# Altium PCB FMM-v1.0.PcbDoc (part 1 of 5)
Units mm, origin at the board's own origin, x right, y up, seen from the top; angles counter-clockwise.
Board outline 115 x 96 mm, 4 copper layers (Top Layer, Power Layer, Ground Layer, Bottom Layer), stack 1.57 mm thick; 218 components, 129 nets, 744 pads, 321 vias.
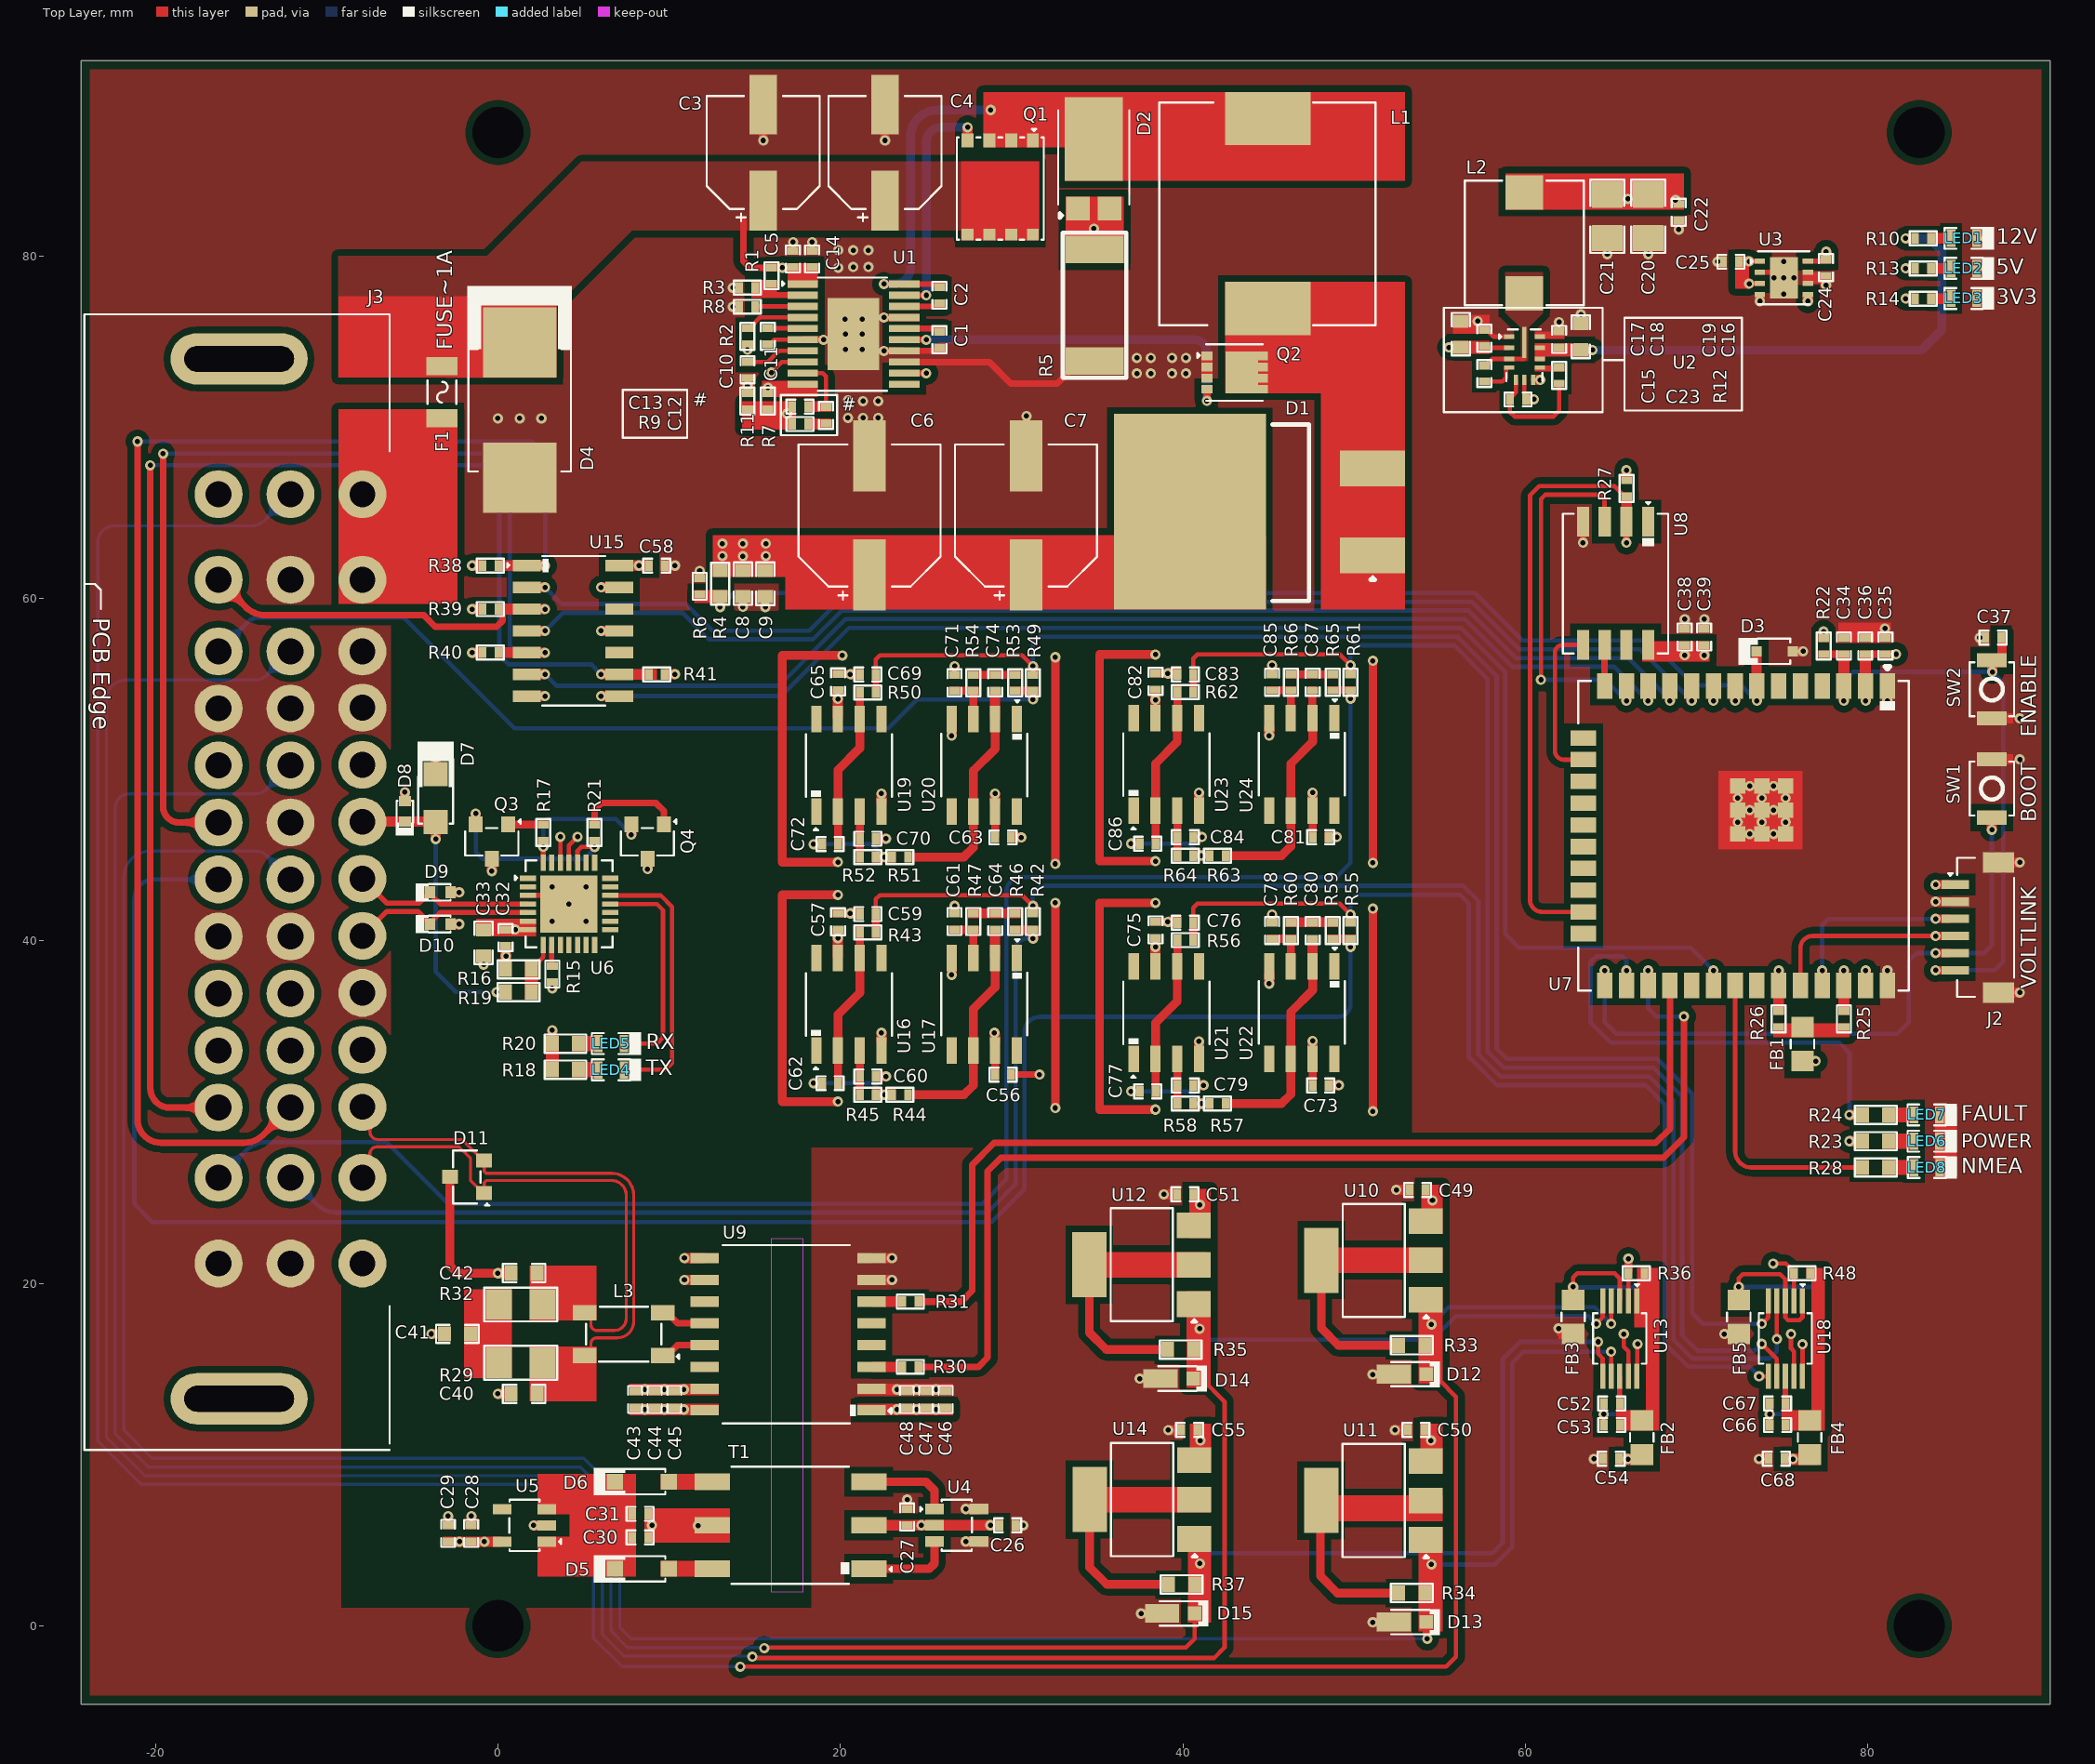
[diagram p0: Top Layer view]
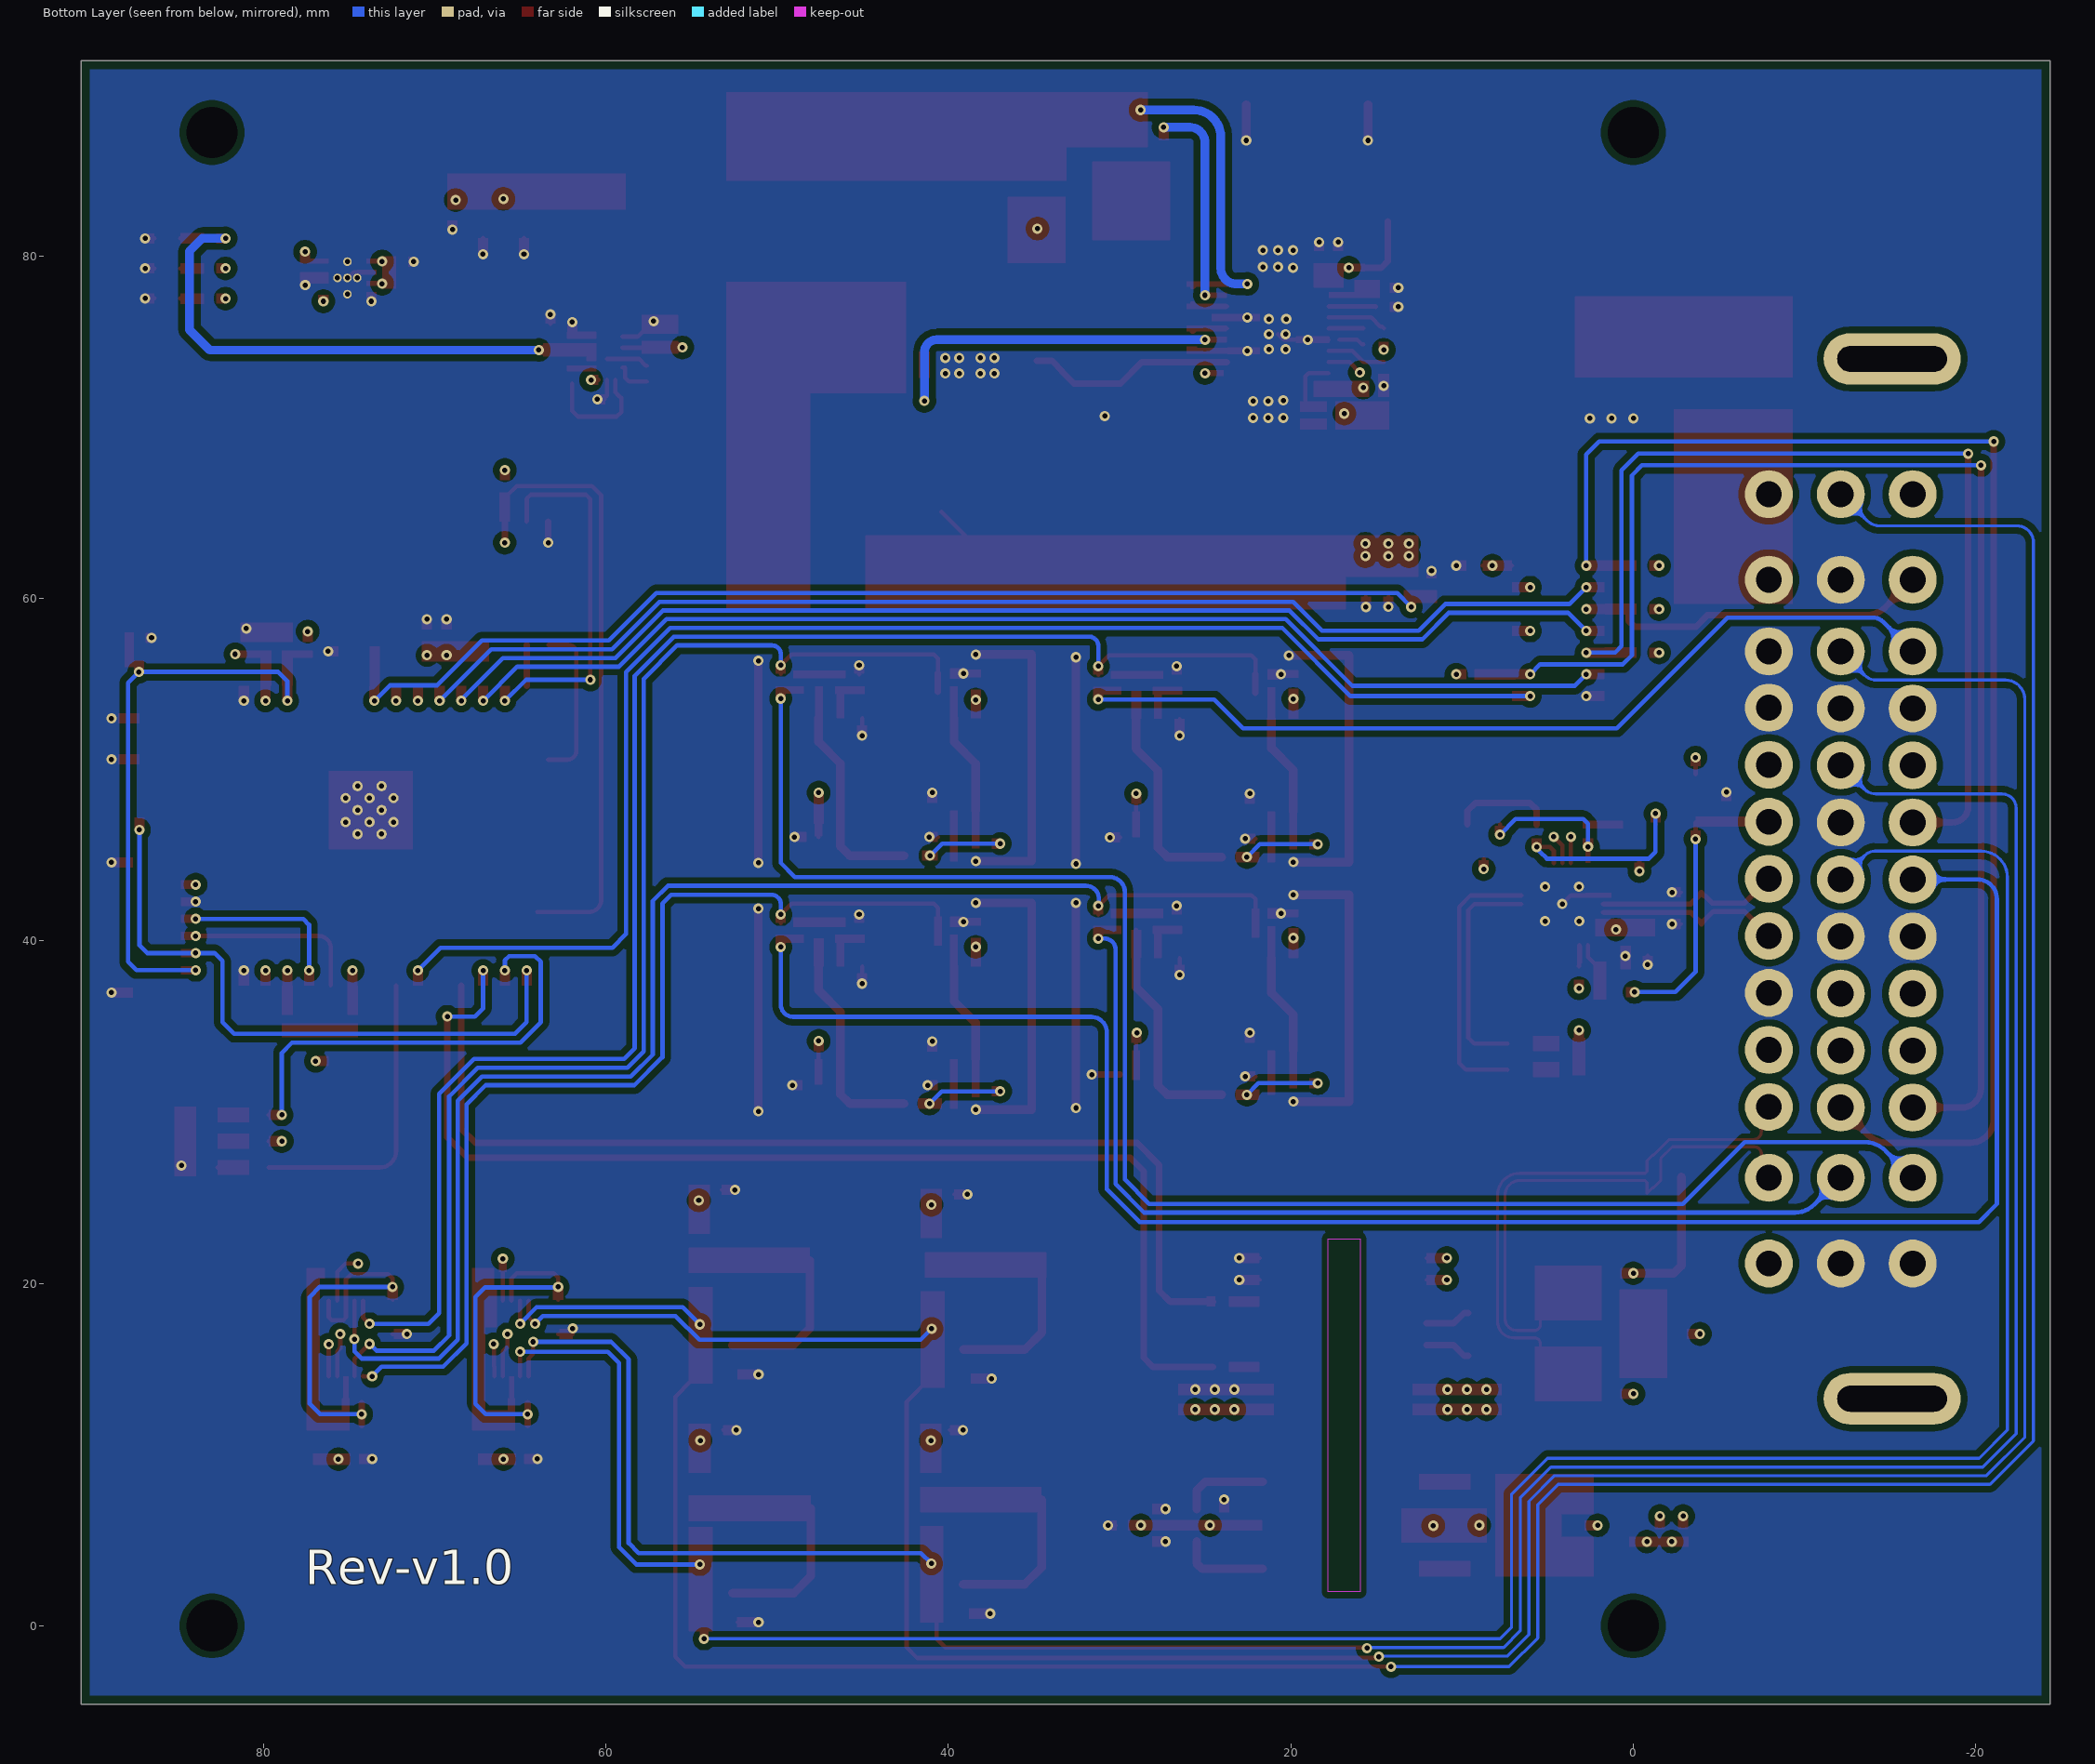
[diagram p1: Bottom Layer view, seen from below]
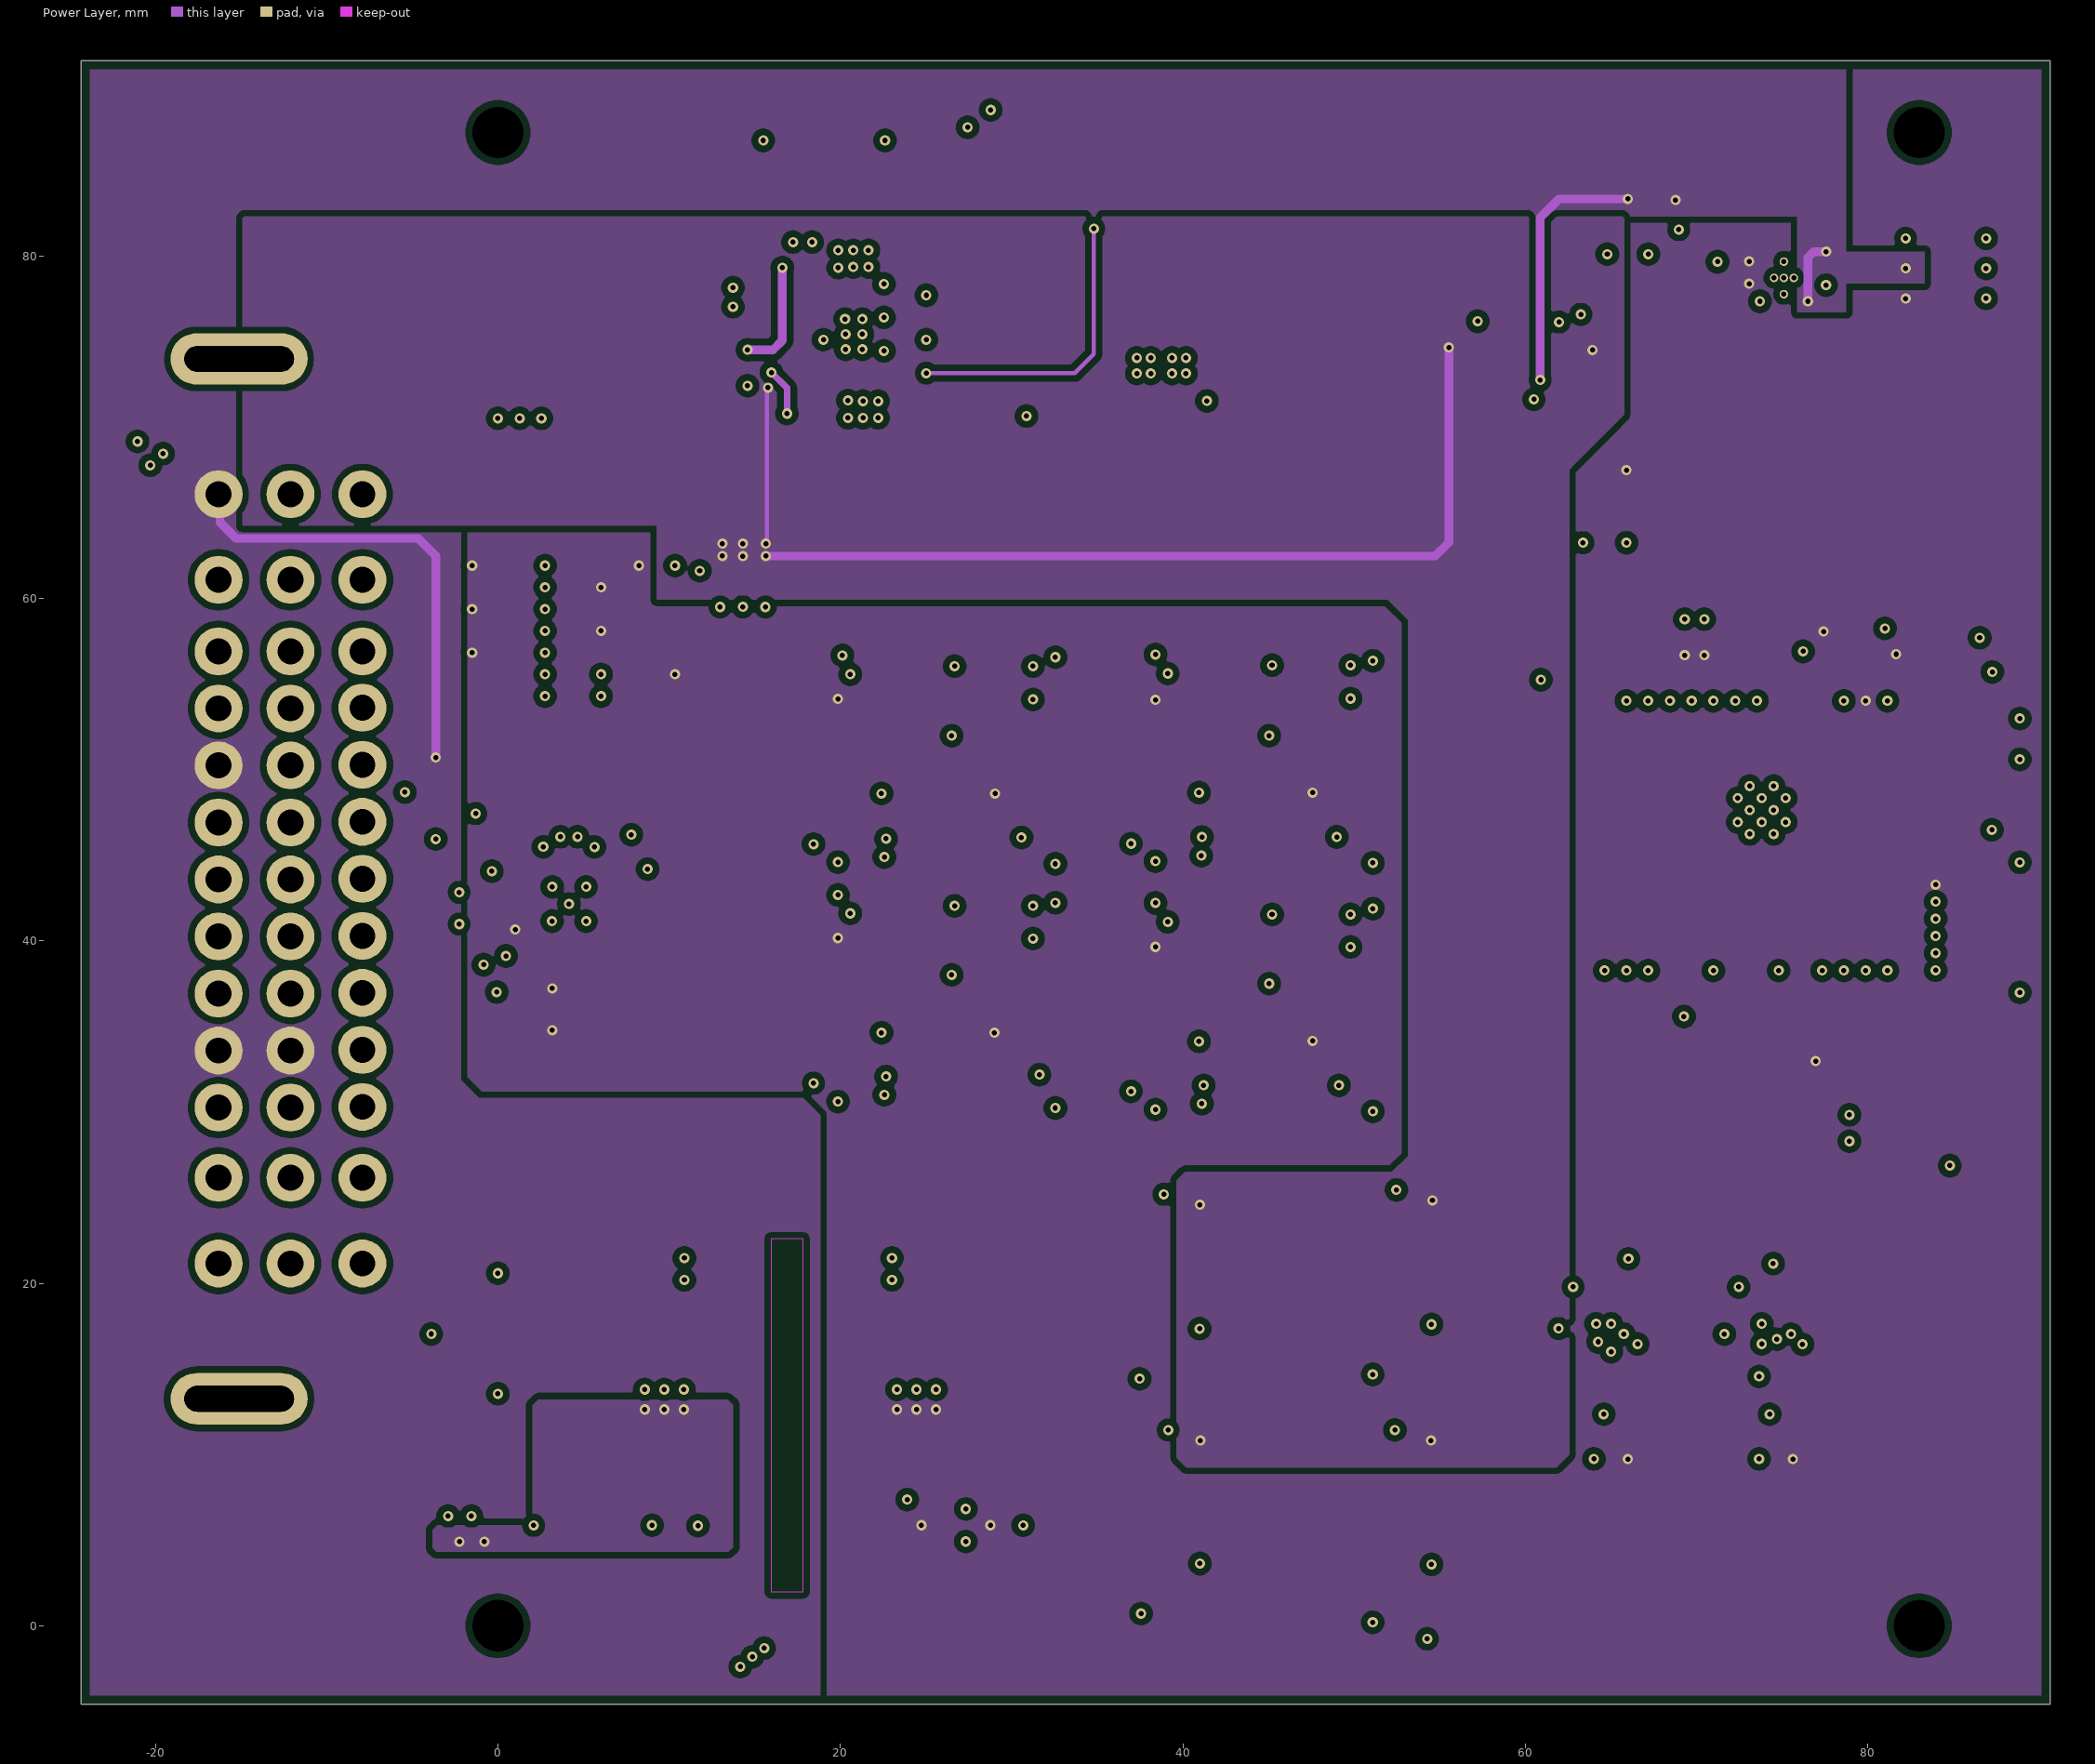
[diagram p2: Power Layer]
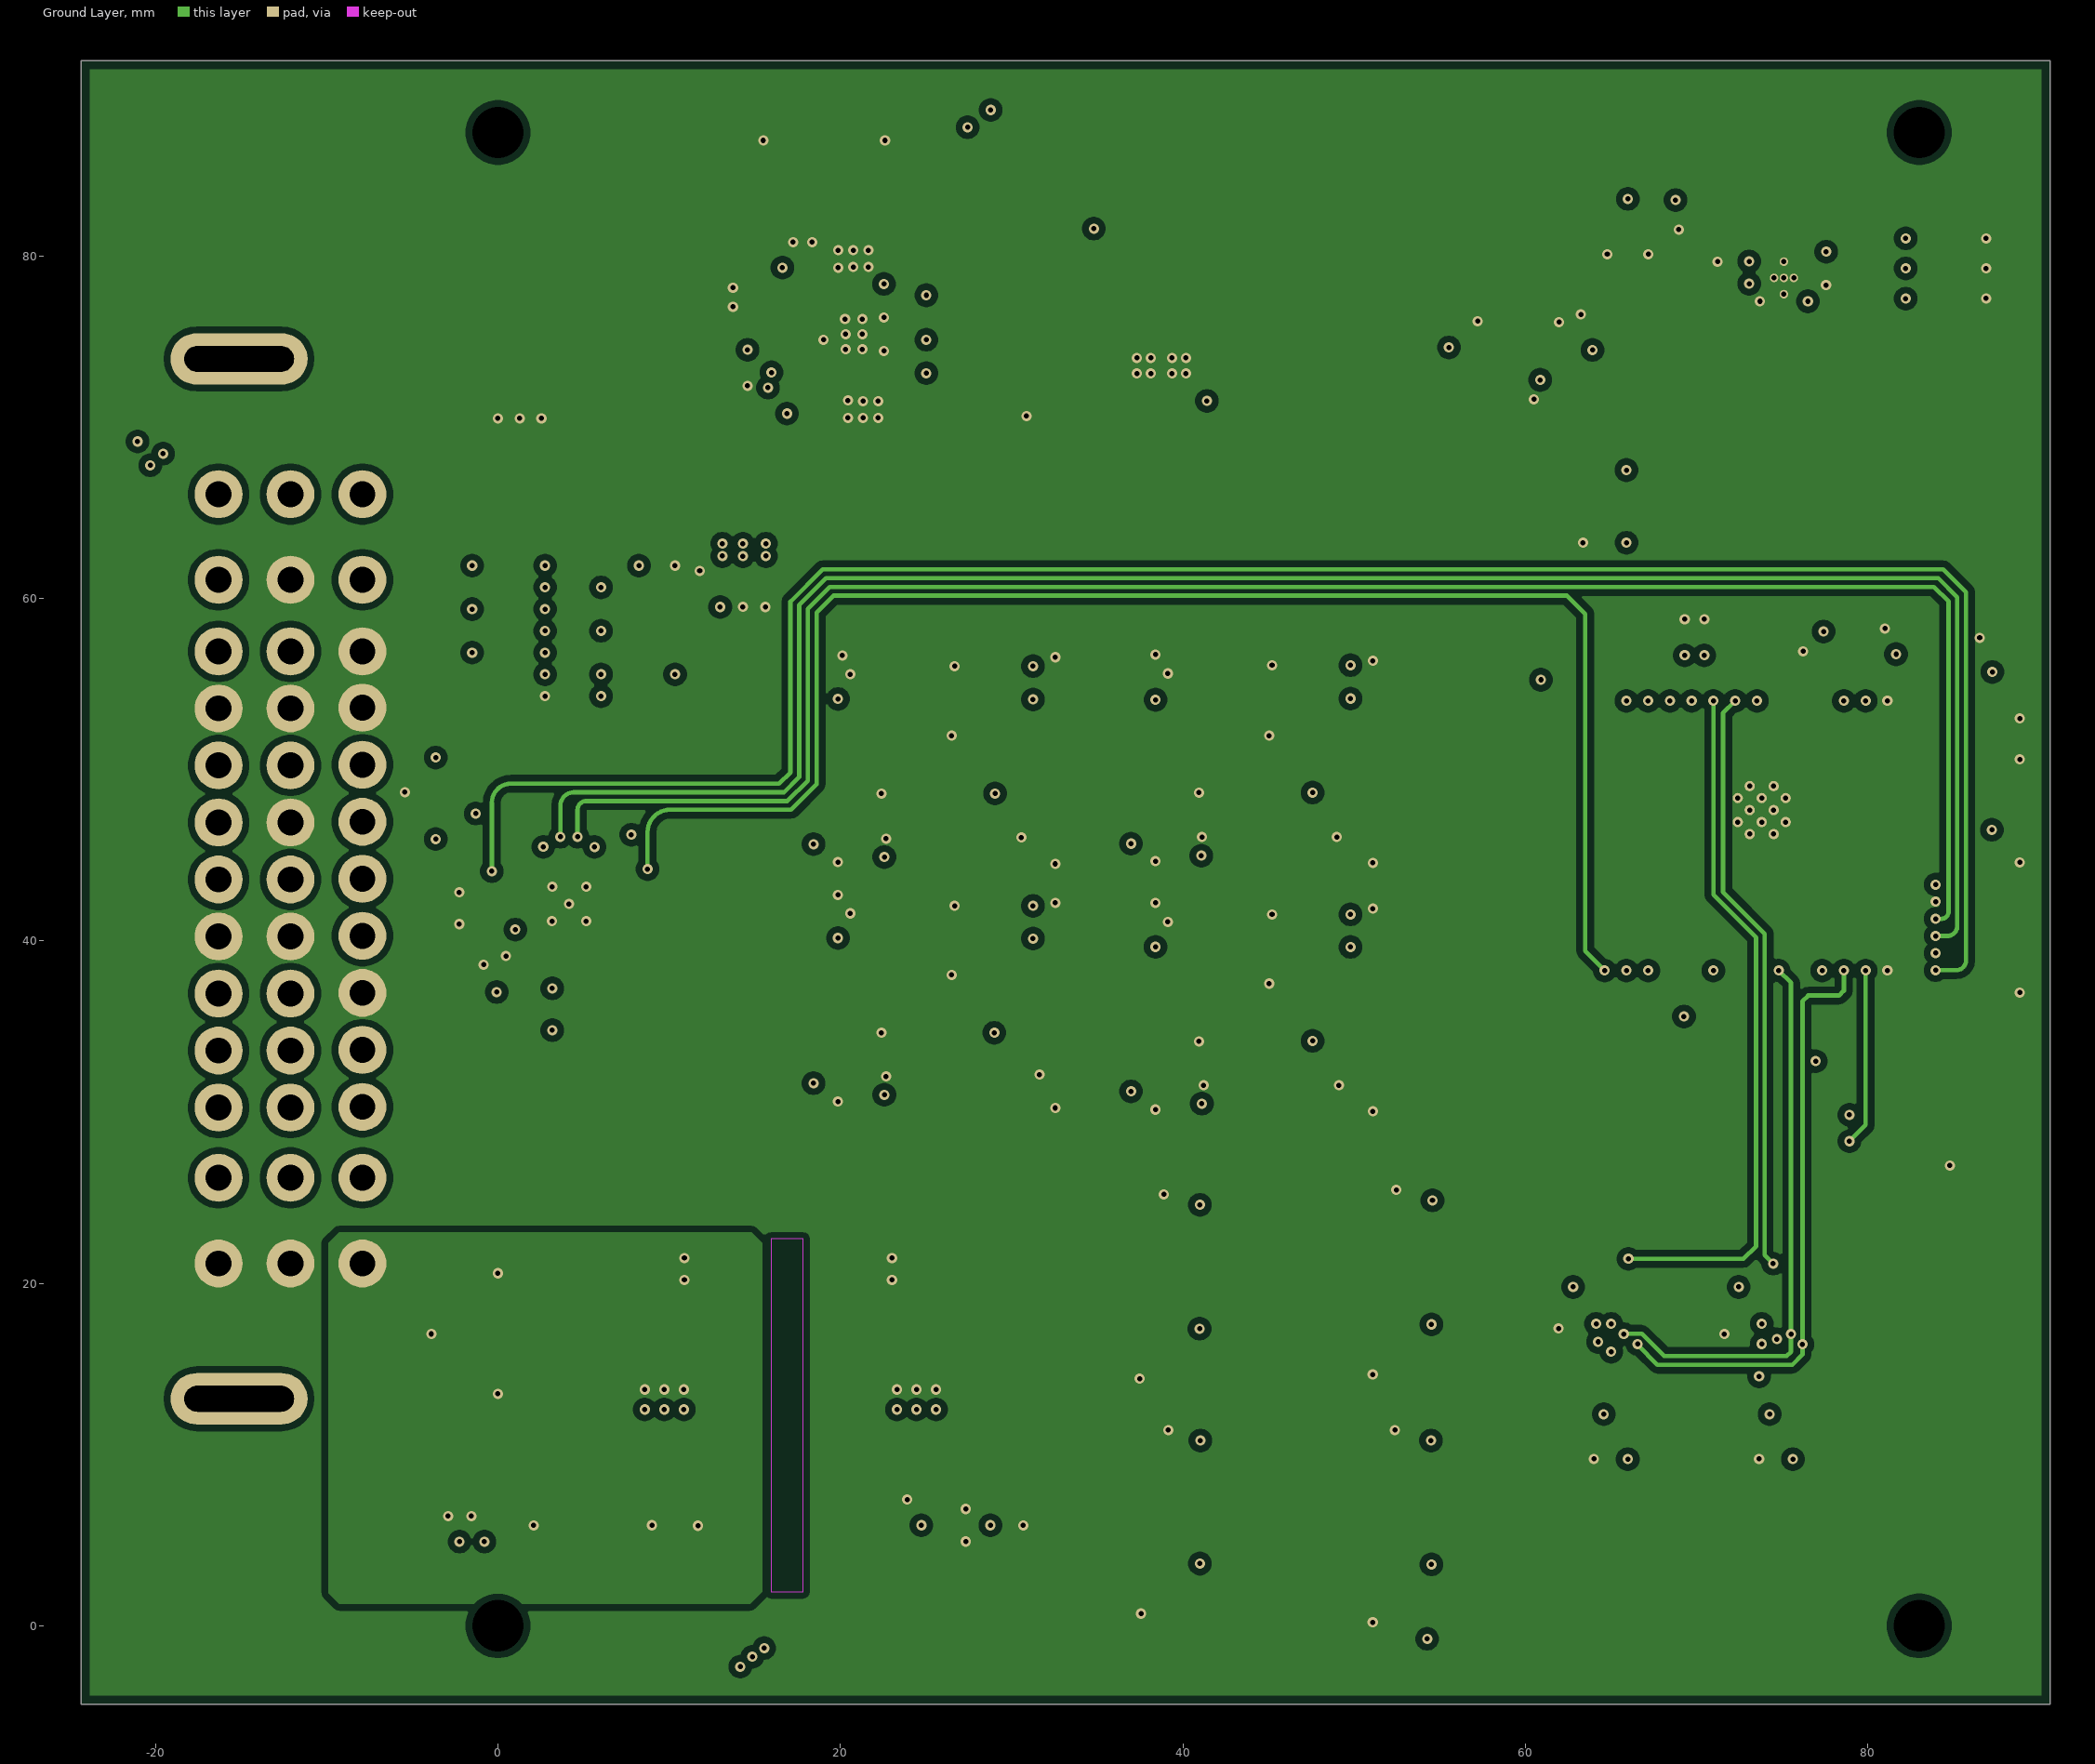
[diagram p3: Ground Layer]
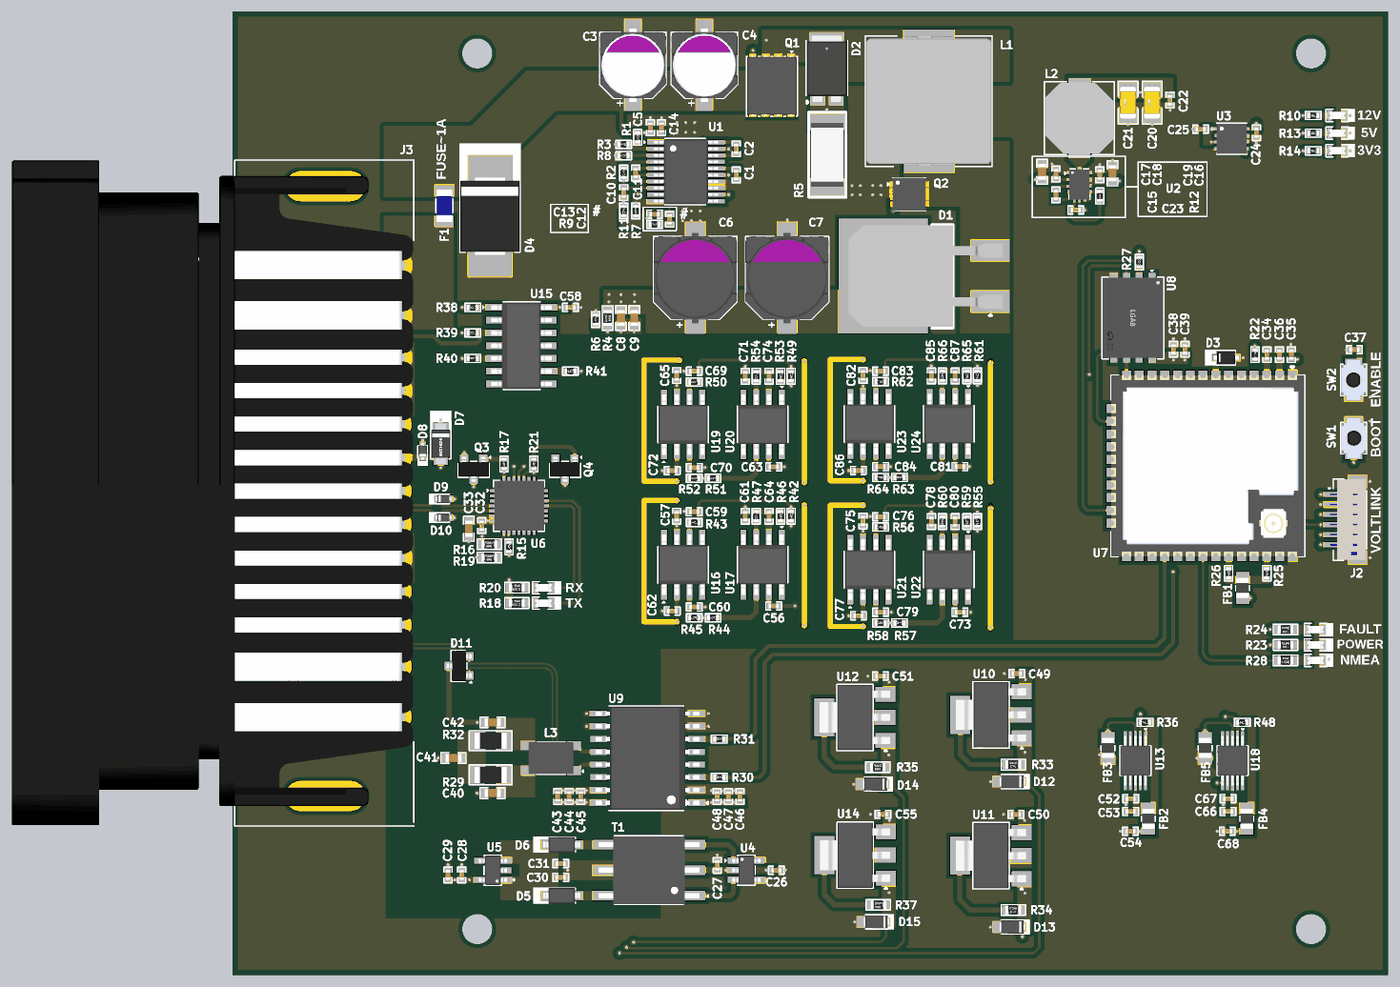
[diagram p6: 3D render of the assembled board from above, using the file's embedded part models]

## Layer stack, top to bottom
Top Solder: solder mask 0.0102, Solder Resist, Dk 3.5
Top Layer: signal copper 0.035
Dielectric 2: prepreg 0.2, PP-006, Dk 4.1
Power Layer: signal copper 0.035
Dielectric 1: core 1.03, FR-4, Dk 4.8
Ground Layer: signal copper 0.035
Dielectric 3: prepreg 0.2, PP-006, Dk 4.1
Bottom Layer: signal copper 0.035
Bottom Solder: solder mask 0.0102, Solder Resist, Dk 3.5

## Board outline
-24.346,-4.596 -24.346,91.404 90.654,91.404 90.654,-4.596

## Design rules (kind name [scope] priority, off if disabled: settings)
BoardOutlineClearance [All] p1: gap=0.254 ignorepadtopadclearanceinfootprint=FALSE except(0: Arc-SplitContinuation Track-OutlineEdge Track-SplitContinuation SMDPad-SplitContinuation THPad-SplitContinuation Via-SplitContinuation Fill-SplitContinuation Poly-SplitContinuation Region-SplitContinuation Text-OutlineEdge Text-SplitContinuation; 0.508: Poly-OutlineEdge)
Clearance [All] p1: gap=0.254 ignorepadtopadclearanceinfootprint=TRUE except(0: Arc-Hole Track-Hole SMDPad-Hole THPad-Hole Via-Hole Fill-Hole Poly-Hole Region-Hole Text-Hole; 0.127: Arc-Via Track-SMDPad Track-THPad SMDPad-SMDPad SMDPad-Via THPad-Via Via-Via; 0.152: Track-Via; 0.178: Arc-Track Arc-SMDPad Arc-THPad Arc-Fill Track-Track Track-Fill SMDPad-THPad SMDPad-Fill THPad-THPad THPad-Fill Via-Fill Fill-Fill; 0.381: Arc-Poly Track-Poly SMDPad-Poly THPad-Poly Via-Poly Fill-Poly Poly-Poly)
ComponentClearance [All] p1: gap=0 collisioncheckmode=3 verticalgap=0 showdistances=FALSE
DiffPairsRouting CAN_LINES [InDifferentialPairClass('CAN_Lines')] p1: maxlimit=0.508 minlimit=0.254 mostfreqgap=0.508 toplayer_maxgap=0.254 toplayer_prefgap=0.254 toplayer_minwidth=0.178 toplayer_maxwidth=0.178 toplayer_prefwidth=0.178 midlayer1_mingap=0.508 midlayer1_minwidth=0.127 midlayer1_maxwidth=0.127 midlayer1_prefwidth=0.127 midlayer2_mingap=0.508 midlayer2_minwidth=0.127 midlayer2_maxwidth=0.127 midlayer2_prefwidth=0.127 bottomlayer_maxgap=0.254 bottomlayer_prefgap=0.254 bottomlayer_minwidth=0.178 bottomlayer_maxwidth=0.178 bottomlayer_prefwidth=0.178 impedanceprofiledriven=TRUE impedanceprofileid={0E32D323-E724-4781-884D-5F567CD5C0D5} impedanceprofilevalue=120.000000 maxuncoupledlength=12.7
DiffPairsRouting USB_LINES [InDifferentialPairClass('USB_Lines')] p2: maxlimit=0.178 minlimit=0.127 mostfreqgap=0.178 toplayer_mingap=0.178 toplayer_minwidth=0.305 toplayer_maxwidth=0.305 toplayer_prefwidth=0.305 midlayer1_maxgap=0.127 midlayer1_prefgap=0.127 midlayer1_minwidth=0.11 midlayer1_maxwidth=0.11 midlayer1_prefwidth=0.11 midlayer2_maxgap=0.127 midlayer2_prefgap=0.127 midlayer2_minwidth=0.11 midlayer2_maxwidth=0.11 midlayer2_prefwidth=0.11 bottomlayer_mingap=0.178 bottomlayer_minwidth=0.305 bottomlayer_maxwidth=0.305 bottomlayer_prefwidth=0.305 impedanceprofiledriven=TRUE impedanceprofileid={E6FEBE54-74DC-4B90-955B-5A92F8A1337A} impedanceprofilevalue=90.000000 maxuncoupledlength=12.7
Height [All] p1: minheight=0 maxheight=100 prefheight=12.7
HoleSize [All] p1: absolutevalues=TRUE maxlimit=10 minlimit=0.025 maxpercent=80.000 minpercent=20.000
MatchedLengths "Schematic Matched Net Lengths" [InNetClass('USB')] p1: tolerance=1.27 checknetsindiffpair=TRUE checkdiffpairvsdiffpair=FALSE checkxsignals=FALSE checkothers=FALSE
MaxMinImpedance "Schematic Impedance Constraint" [InNetClass('USB')] p1: minimum=85.00 maximum=90.00
MinimumSolderMaskSliver [All] p1: minsoldermaskwidth=0
PolygonConnect [All] p1: connectstyle=Direct reliefconductorwidth=0.508 reliefentries=4 polygonreliefangle="90 Angle" airgapwidth=0.254
RoutingVias [All] p1: holewidth=0.3 width=0.6 viastyle="Through Hole" minholewidth=0.3 minwidth=0.6 maxholewidth=0.3 maxwidth=0.6
SilkToSilkClearance [All] p1: silktosilkclearance=0
SilkToSolderMaskClearance [IsPad] p1: minsilkscreentomaskgap=0 clearancetoexposedcopper=TRUE
SolderMaskExpansion [All] p1: expansion=0.102 istentingtop=FALSE
UnRoutedNet [All] p1: checkbadconnections=TRUE
Width [All] p1: maxlimit=0.508 minlimit=0.127 preferedwidth=0.254 minimp=50.000000 maximp=50.000000 favimp=50.000000
22 further rules are at their usual default settings.

## Classes and differential pairs
differential pair class CAN_Lines: CAN
net class CAN: CAN_N CAN_P
component class U_Connector-Sheet: J3
differential pair class USB_Lines: USB_D
net class USB: USB_D_N USB_D_P
component class U_USB-to-UART-Sheet: C32 C33 D7 D8 D9 D10 LED4 LED5 Q3 Q4 R15 R16 R17 R18 R19 R20 R21 U6
component class U_Tank-Level-Sensor-Sheet: C49 C50 C51 C52 C53 C54 C55 D12 D13 D14 D15 FB2 FB3 R33 R34 R35 R36 R37 U10 U11 U12 U13 U14
component class U_Storage-Sheet: C38 C39 R27 U8
component class U_Power-Sheet-2: C24 C25 C26 C27 C28 C29 C30 C31 D5 D6 LED3 R14 T1 U3 U4 U5
component class U_Power-Sheet-1: C1 C2 C3 C4 C5 C6 C7 C8 C9 C10 C11 C12 C13 C14 C15 C16 C17 C18 C19 C20 C21 C22 C23 D1 D2 D3 D4 F1 L1 L2 LED1 LED2 Q1 Q2 R1 R2 R3 R4 R5 R6 R7 R8 R9 R10 R11 R12 R13 U1 U2
component class U_Fuel-Sensor-Sheet: C56 C57 C58 C59 C60 C61 C62 C63 C64 C65 C66 C67 C68 C69 C70 C71 C72 C73 C74 C75 C76 C77 C78 C79 C80 C81 C82 C83 C84 C85 C86 C87 FB4 FB5 R38 R39 R40 R41 R42 R43 R44 R45 R46 R47 R48 R49 R50 R51 R52 R53 R54 R55 R56 R57 R58 R59 R60 R61 R62 R63 R64 R65 R66 U15 U16 U17 U18 U19 U20 U21 U22 U23 U24
component class U_Controller-Sheet: C34 C35 C36 C37 FB1 J2 LED6 LED7 R22 R23 R24 R25 R26 SW1 SW2 U7
component class U_CAN-Transceiver-Sheet: C40 C41 C42 C43 C44 C45 C46 C47 C48 D11 L3 LED8 R28 R29 R30 R31 R32 U9
differential pair CAN: +CAN_P -CAN_N
differential pair USB_D: +USB_D_P -USB_D_N

## Components (designator, comment, footprint, x,y, rotation, side; value= is the part's Value field where it differs from the comment)
C1 "1uF" Cap-0402 25.781,75.108 r90 top
C2 "0.1uF" Cap-0402 25.781,77.702 r270 top
C3 "10uF" 50SVPF10M 15.494,86.03 r90 top
C4 "10uF" 50SVPF10M 22.606,86.03 r90 top
C5 "0.1uF" Cap-0402 17.231,79.814 r270 top
C6 "100uF" 25SVPF100M 21.702,64.838 r90 top
C7 "100uF" 25SVPF100M 30.846,64.838 r90 top
C8 "470nF" Cap-0603 14.3,60.858 r90 top
C9 "470nF" Cap-0603 15.624,60.855 r90 top
C10 "22nF" Cap-0402 14.577,73.337 r90 top
C11 "470pF" Cap-0402 15.771,75.301 r90 top
C12 "47nF" Cap-0402 19.152,70.688 r270 top
C13 "1nF" Cap-0402 17.64,71.196 r0 top
C14 "0.1uF" Cap-0402 18.349,79.814 r270 top
C15 "0.1uF" Cap-0402 57.6,73.124 r90 top
C16 "4.7UF" Cap-0603 63.239,75.27 r270 top
C17 "4.7UF" Cap-0603 56.229,75.423 r270 top
C18 "0.1uF" Cap-0402 57.6,75.194 r270 top
C19 "0.1uF" Cap-0402 61.969,75.118 r270 top
C20 "47uF" Cap-1206 67.176,82.306 r90 top
C21 "47uF" Cap-1206 64.785,82.306 r90 top
C22 "0.1uF" Cap-0402 68.961,82.55 r90 top
C23 "1uF" Cap-0402 59.574,71.613 r180 top
C24 "1uF" Cap-0402 77.561,79.308 r270 top
C25 "10uF" Cap-0402 72.009,79.656 r0 top
C26 "10uF" Cap-0402 29.769,5.87 r180 top
C27 "0.1uF" Cap-0402 23.898,6.353 r270 top
C28 "10uF" Cap-0402 -1.553,5.394 r270 top
C29 "0.1uF" Cap-0402 -2.907,5.394 r270 top
C30 "10uF" Cap-0402 8.303,5.163 r180 top
C31 "0.1uF" Cap-0402 8.303,6.532 r180 top
C32 "1uF" Cap-0402 0.45,40.181 r270 top
C33 "4.7UF" Cap-0603 -0.838,39.878 r90 top
C34 "0.1uF" Cap-0402 78.603,57.207 r270 top
C35 "22uF" Cap-0402 81.036,57.208 r270 top
C36 "0.1uF" Cap-0402 79.851,57.208 r270 top
C37 "0.1uF" Cap-0402 87.314,57.698 r0 top
C38 "0.1uF" Cap-0402 69.306,57.74 r270 top
C39 "10uF" Cap-0402 70.449,57.74 r270 top
C40 "68pF" Cap-0603 1.527,13.545 r0 top
C41 "4.7nF" Cap-0603 -2.362,17.043 r180 top
C42 "68pF" Cap-0603 1.527,20.587 r180 top
C43 "10uF" Cap-0402 8.011,13.215 r270 top
C44 "1uF" Cap-0402 9.154,13.215 r90 top
C45 "0.1uF" Cap-0402 10.297,13.215 r270 top
C46 "10uF" Cap-0402 26.147,13.215 r270 top
C47 "1uF" Cap-0402 25.004,13.215 r90 top
C48 "0.1uF" Cap-0402 23.873,13.215 r270 top
C49 "0.1uF" Cap-0402 53.708,25.451 r0 top
C50 "0.1uF" Cap-0402 53.621,11.433 r0 top
C51 "0.1uF" Cap-0402 40.127,25.197 r0 top
C52 "0.1uF" Cap-0402 65.049,12.991 r180 top
C53 "1uF" Cap-0402 65.049,11.721 r180 top
C54 "1uF" Cap-0402 65.015,9.746 r180 top
C55 "0.1uF" Cap-0402 40.381,11.433 r0 top
C56 "0.1uF" Cap-0402 29.505,32.185 r0 top
C57 "0.1uF" Cap-0402 19.86,41.119 r90 top
C58 "0.1uF" Cap-0402 9.277,61.91 r0 top
C59 "22nF" Cap-0402 21.6,41.563 r0 top
C60 "22nF" Cap-0402 21.6,32.076 r180 top
C61 "22nF" Cap-0402 26.668,41.123 r270 top
C62 "0.1uF" Cap-0402 19.402,31.682 r0 top value=100nF
C63 "0.1uF" Cap-0402 29.505,46.037 r0 top
C64 "15nF" Cap-0402 29.035,41.123 r270 top
C65 "0.1uF" Cap-0402 19.86,55.118 r90 top
C66 "0.1uF" Cap-0402 74.735,11.721 r180 top
C67 "1uF" Cap-0402 74.735,12.991 r180 top
C68 "1uF" Cap-0402 74.659,9.746 r180 top
C69 "22nF" Cap-0402 21.6,55.562 r0 top
C70 "22nF" Cap-0402 21.6,45.96 r180 top
C71 "22nF" Cap-0402 26.668,55.066 r270 top
C72 "0.1uF" Cap-0402 19.402,45.645 r0 top value=100nF
C73 "0.1uF" Cap-0402 48.047,31.559 r0 top
C74 "15nF" Cap-0402 29.035,55.066 r270 top
C75 "0.1uF" Cap-0402 38.402,40.639 r90 top
C76 "22nF" Cap-0402 40.142,41.058 r0 top
C77 "22nF" Cap-0402 40.142,31.559 r180 top
C78 "22nF" Cap-0402 45.21,40.588 r270 top
C79 "0.1uF" Cap-0402 37.943,31.208 r0 top value=100nF
C80 "15nF" Cap-0402 47.577,40.588 r270 top
C81 "0.1uF" Cap-0402 48.047,46.062 r0 top
C82 "0.1uF" Cap-0402 38.402,55.143 r90 top
C83 "22nF" Cap-0402 40.142,55.562 r0 top
C84 "22nF" Cap-0402 40.142,46.062 r180 top
C85 "22nF" Cap-0402 45.21,55.092 r270 top
C86 "0.1uF" Cap-0402 37.943,45.674 r0 top value=100nF
C87 "15nF" Cap-0402 47.577,55.092 r270 top
D1 "STPS20M100SG-TR" D2Pak. 45.745,65.049 r90 top
D2 "PDS760-13" Power-DI-5 34.798,84.794 r270 top
D3 "MM3Z3V3B" SOD323F 74.559,56.903 r180 top
D4 "3.0SMCJ30AQ-13" SMC 1.27,70.993 r270 top
D5 "MBR0520LT1G" SOD-123 8.404,3.33 r180 top
D6 "MBR0520LT1G" SOD-123 8.404,8.41 r180 top
D7 "PMEG3010ER,115" SOD-123W -3.632,48.331 r90 top
D8 "LESD5D5.0CT1G" SOD-523 -5.436,47.563 r270 top
D9 "LESD5D5.0CT1G" SOD-523 -3.376,42.831 r180 top
D10 "LESD5D5.0CT1G" SOD-523 -3.376,40.977 r180 top
D11 "CDSOT23-SM712" SOT-23 -1.803,26.213 r90 top value=75pF
D12 "MSP3V3HM3/89A" MicroSMP 53.266,14.691 r0 top
D13 "MSP3V3HM3/89A" MicroSMP 53.266,0.217 r0 top
D14 "MSP3V3HM3/89A" MicroSMP 39.651,14.437 r0 top
D15 "MSP3V3HM3/89A" MicroSMP 39.739,0.723 r0 top
F1 "BSMD1206-100-16V" "Fuse 1206 (3216 Metric)" -3.271,72.034 r90 top
FB1 "MMZ2012R102ATD25" Ind-0805 76.184,33.97 r90 top
FB2 "MMZ2012R102ATD25" Ind-0805 66.802,10.998 r270 top
FB3 "MMZ2012R102ATD25" Ind-0805 62.789,18.034 r270 top
FB4 "MMZ2012R102ATD25" Ind-0805 76.606,10.998 r270 top
FB5 "MMZ2012R102ATD25" Ind-0805 72.466,18.034 r270 top
J2 "Voltlink Target" "Voltlink Target" 86.367,40.782 r270 top locked
J3 "DJ7391-1.5/2.8-10" DJ7391-1.5/2.8-10 -12.114,43.619 r270 top locked
L1 "8.2uH" SRP1265A-8R2M 44.958,82.474 r270 top
L2 "2.2uH" CLF7045T-2R2N-D 59.937,80.757 r90 top
L3 "ACT45B-510-2P-TL003" ACT45B-510-2P-TL003 7.351,17.025 r180 top value=51uH
LED1 "RED" LED-0603 85.61,81.021 r0 top
LED2 "RED" LED-0603 85.61,79.268 r0 top
LED3 "RED" LED-0603 85.61,77.516 r0 top
LED4 "Yellow" LED-0603 6.604,32.461 r0 top
LED5 "Yellow" LED-0603 6.604,33.998 r0 top
LED6 "Emerald" LED-0603 83.439,28.297 r0 top
LED7 "RED" LED-0603 83.439,29.833 r0 top
LED8 "Blue" LED-0603 83.447,26.76 r0 top
Q1 "CSD18504Q5A" "8-VSONP (5X6)" 29.335,83.991 r270 top locked
Q2 "CSD17309Q3" "8-VSON-CLIP (3.3x3.3)" 43.002,73.183 r0 top
Q3 "SS8050-G" SOT-23 -0.356,45.796 r180 top
Q4 "SS8050-G" SOT-23 8.738,45.796 r180 top
R1 "34.8k" Res-0402 15.977,78.842 r90 top value=34.8kR
R2 "1M" Res-0402 14.577,75.301 r270 top value=1MR
R3 "12.1k" Res-0402 14.564,78.142 r0 top
R4 "47K" Res-0603 12.979,60.855 r90 top
R5 "10mΩ" RES-2512 34.844,77.113 r270 top value=10mR
R6 "1.6K" Res-0402 11.786,60.706 r270 top
R7 "8.66k" Res-0402 15.771,71.514 r90 top
R8 "21k" Res-0402 14.564,77.025 r0 top value=21kR
R9 "10K" Res-0402 17.64,70.18 r180 top
R10 "1.5K" Res-0402 83.227,81.021 r0 top
R11 "1K" Res-0402 14.577,71.514 r270 top
R12 "100K" Res-0402 61.969,73.01 r90 top
R13 "499R" Res-0402 83.227,79.268 r0 top
R14 "240R" Res-0402 83.227,77.504 r0 top
R15 "2K" Res-0402 3.176,38.054 r90 top value=2kR
R16 "22.1K" Res-0603 1.207,37.008 r0 top
R17 "10K" Res-0402 2.649,46.317 r90 top
R18 "220R" Res-0603 3.942,32.474 r180 top
R19 "47.5K" Res-0603 1.207,38.333 r0 top
R20 "220R" Res-0603 3.942,33.998 r180 top
R21 "10K" Res-0402 5.639,46.317 r90 top
R22 "10K" Res-0402 77.418,57.208 r90 top
R23 "49.9R" Res-0603 80.459,28.297 r0 top
R24 "240R" Res-0603 80.459,29.833 r0 top
R25 "4.7K" Res-0402 78.603,35.433 r90 top
R26 "4.7K" Res-0402 74.793,35.433 r90 top
R27 "10K" Res-0402 65.905,66.421 r90 top
R28 "22R" Res-0603 80.459,26.76 r180 top
R29 "59R" Res-1206 1.334,15.363 r0 top
R30 "0R" Res-0402 24.089,15.12 r180 top
R31 "0R" Res-0402 24.089,18.93 r180 top
R32 "59R" Res-1206 1.334,18.763 r180 top
R33 "120R" Res-0603 53.367,16.384 r0 top
R34 "120R" Res-0603 53.367,1.91 r0 top
R35 "120R" Res-0603 39.873,16.13 r0 top
R36 "10K" Res-0402 66.489,20.586 r0 top
R37 "120R" Res-0603 39.927,2.416 r0 top
R38 "1K" Res-0402 -0.438,61.91 r180 top
R39 "1K" Res-0402 -0.438,59.37 r180 top
R40 "1K" Res-0402 -0.438,56.83 r180 top
R41 "1K" Res-0402 9.277,55.56 r0 top
R42 "DNP" Res-0402 31.246,41.123 r90 top
R43 "27K" Res-0402 21.6,40.496 r0 top value=27kR
R44 "8.2K" Res-0402 23.48,31.009 r180 top value=8.2kR
R45 "8.2K" Res-0402 21.6,31.009 r180 top value=8.2kR
R46 "22.1K" Res-0402 30.203,41.123 r90 top value=22.1kR
R47 "22.1K" Res-0402 27.765,41.123 r270 top value=22.1kR
R48 "10K" Res-0402 76.159,20.586 r0 top
R49 "DNP" Res-0402 31.246,55.066 r90 top
R50 "27K" Res-0402 21.6,54.49 r0 top value=27kR
R51 "8.2K" Res-0402 23.48,44.894 r180 top value=8.2kR
R52 "8.2K" Res-0402 21.6,44.894 r180 top value=8.2kR
R53 "22.1K" Res-0402 30.203,55.066 r90 top value=22.1kR
R54 "22.1K" Res-0402 27.765,55.066 r270 top value=22.1kR
R55 "DNP" Res-0402 49.788,40.588 r90 top
R56 "27K" Res-0402 40.142,40.042 r0 top value=27kR
R57 "8.2K" Res-0402 42.022,30.492 r180 top value=8.2kR
R58 "8.2K" Res-0402 40.142,30.492 r180 top value=8.2kR
R59 "22.1K" Res-0402 48.745,40.588 r90 top value=22.1kR
R60 "22.1K" Res-0402 46.307,40.588 r270 top value=22.1kR
R61 "DNP" Res-0402 49.788,55.092 r90 top
R62 "27K" Res-0402 40.142,54.52 r0 top value=27kR
R63 "8.2K" Res-0402 42.022,44.97 r180 top value=8.2kR
R64 "8.2K" Res-0402 40.142,44.97 r180 top value=8.2kR
R65 "22.1K" Res-0402 48.745,55.092 r90 top value=22.1kR
R66 "22.1K" Res-0402 46.307,55.092 r270 top value=22.1kR
SW1 "B3U-1000P" B3U-1000P 87.243,48.895 r90 top
SW2 "B3U-1000P" B3U-1000P 87.243,54.681 r270 top
T1 "760390015" 760390015 17.091,5.87 r180 top value=475uH
U1 "LM25118Q1MHX/NOPB" 20-HTSSOP 20.765,75.427 r0 top
U2 "LMR33620CQ5RNXRQ1" "12-VQFN-HR (3x2)" 59.945,74.018 r0 top
U3 "TLV76733QWDRBRQ1" "8-SON (3X3)" 75.1,78.712 r0 top
U4 "SN6501QDBVRQ1" SOT-23-5 26.794,5.87 r0 top
U5 "TPS76350QDBVRQ1" SOT-23-5 1.551,5.86 r180 top
U6 "CP2102N-A02-GQFN28R" "28-QFN (5x5)_" 4.149,42.151 r0 top locked
U7 "ESP32-WROOM-32UE-N16" ESP32-WROOM-32UE-N16 72.263,46.138 r270 top locked
U8 "XTSD01GLGEAG" XTSD01GLGEAG 65.27,60.878 r270 top locked
U9 "ISO1050DWR" SOIC-16-300mil 16.952,17.025 r180 top locked
U10 "LM317MDCYR" "SOT- 223" 51.136,21.337 r90 top
U11 "LM317MDCYR" "SOT- 223" 51.128,7.315 r90 top
U12 "LM317MDCYR" "SOT- 223" 37.587,21.083 r90 top
U13 "ADS1115IDGSR" VSSOP-10 65.515,16.776 r270 top
U14 "LM317MDCYR" "SOT- 223" 37.609,7.369 r90 top
U15 "SN74HC14QDRQ1" SOIC-14 4.387,58.1 r0 top locked
U16 "OPA350UA/2K5" "SOIC-8(0.154\", 3.90mm Width)" 20.495,36.292 r90 top
U17 "OPA350UA/2K5" "SOIC-8(0.154\", 3.90mm Width)" 28.4,36.292 r270 top
U18 "ADS1115IDGSR" VSSOP-10 75.184,16.776 r270 top
U19 "OPA350UA/2K5" "SOIC-8(0.154\", 3.90mm Width)" 20.495,50.253 r90 top
U20 "OPA350UA/2K5" "SOIC-8(0.154\", 3.90mm Width)" 28.4,50.253 r270 top
U21 "OPA350UA/2K5" "SOIC-8(0.154\", 3.90mm Width)" 39.037,35.8 r90 top
U22 "OPA350UA/2K5" "SOIC-8(0.154\", 3.90mm Width)" 46.942,35.8 r270 top
U23 "OPA350UA/2K5" "SOIC-8(0.154\", 3.90mm Width)" 39.037,50.304 r90 top
U24 "OPA350UA/2K5" "SOIC-8(0.154\", 3.90mm Width)" 46.942,50.304 r270 top

## Footprints (in the part's own frame and the unit in brackets; to place one, negate y for a bottom-side part, rotate by r counter-clockwise, add the part's x,y. Pads: shape width x height; smd on the part's side, far side on the other; paste and mask are expansions set on the pad)
"8-SON (3X3)" [mm]
  rect 0.6x0.31 smd paste+0 mask+0.07: 1(-1.4,0.975) 2(-1.4,0.325) 3(-1.4,-0.325) 4(-1.4,-0.975) 5(1.4,-0.975) 6(1.4,-0.325) 7(1.4,0.325) 8(1.4,0.975)
  round 0.5 hole 0.3 paste+0 mask+0: 9(-0.575,0) 9(0,-0.95) 9(0,0) 9(0,0.95) 9(0.575,0)
  rect 1.65x2.4 smd paste+0 mask+0.07: 9(0,0)
  silkscreen extent -1.96,-1.55 1.5,1.55, body extent -1.5,-1.5 1.5,1.5, height 1
"8-VSON-CLIP (3.3x3.3)" [mm]
  rect 0.65x0.5 smd paste-100 mask+0.05: 1(-1.6,0.975) 2(-1.6,0.325) 3(-1.6,-0.325) 4(-1.6,-0.975)
  rect 0.7x0.5 smd paste-100 mask+0.05: 5(1.6,-0.975) 6(1.6,-0.325) 7(1.6,0.325) 8(1.6,0.975)
  rect 1.9x2.45 smd paste-100 mask+0.05: 8(0.44,0)
  silkscreen extent -2.16,-1.65 1.65,1.65, body extent -1.65,-1.65 1.65,1.65, height 1.1
"8-VSONP (5X6)" [mm]
  rect 0.82x0.7 smd paste-100 mask+0.051: 1(-2.75,1.907) 2(-2.75,0.637) 3(-2.75,-0.633) 4(-2.75,-1.903)
  rect 0.7x0.7 smd paste-100 mask+0.051: 5(2.75,-1.907) 6(2.75,-0.638) 7(2.75,0.632) 8(2.75,1.902)
  Top Layer region: -1.514,-2.28 2.806,-2.28 2.806,2.28 -1.514,2.28
  silkscreen extent -3.42,-2.54 3.05,2.54, body extent -3,-2.45 3,2.45, height 1.1
"12-VQFN-HR (3x2)" [mm]
  rect 0.6x0.25 smd mask+0.075: 1(-0.9,1.263) 2(-0.9,0.613) 3(-0.9,-0.037) 4(-0.9,-0.537) 8(0.9,-0.537) 9(0.9,-0.037) 10(0.9,0.613) 11(0.9,1.263)
  rect 0.25x0.6 smd mask+0.075: 5(-0.5,-1.262) 6(0,-1.262) 7(0.5,-1.262)
  rect 0.25x1.825 smd paste+0 mask+0.075: 12(0,0.925)
  silkscreen extent -1.48,-1.32 1.05,1.68, body extent -1,-1.37 1,1.63, height 0.9
20-HTSSOP [mm]
  rect 1.78x0.42 smd: 1(-2.97,2.925) 2(-2.97,2.275) 3(-2.97,1.625) 4(-2.97,0.975) 5(-2.97,0.325) 6(-2.97,-0.325) 7(-2.97,-0.975) 8(-2.97,-1.625) 9(-2.97,-2.275) 10(-2.97,-2.925) 11(2.97,-2.925) 12(2.97,-2.275) 13(2.97,-1.625) 14(2.97,-0.975) 15(2.97,-0.325) 16(2.97,0.325) 17(2.97,0.975) 18(2.97,1.625) 19(2.97,2.275) 20(2.97,2.925)
  rect 3x4.2 smd: 21(0,0)
  silkscreen extent -4.17,-3.3 1.96,3.3, body extent -3.2,-3.25 3.2,3.25, height 1.1
25SVPF100M [mm]
  rect 4.15x1.9 smd: 1(-3.475,0) 2(3.475,0)
  silkscreen extent -4.9,-4.15 4.15,4.15, body extent -4.5,-4.15 4.5,4.15, height 6.9
"28-QFN (5x5)_" [mm]
  rect 0.95x0.3 smd: 1(-2.4,1.5) 2(-2.4,1) 3(-2.4,0.5) 4(-2.4,0) 5(-2.4,-0.5) 6(-2.4,-1) 7(-2.4,-1.5) 15(2.4,-1.5) 16(2.4,-1) 17(2.4,-0.5) 18(2.4,0) 19(2.4,0.5) 20(2.4,1) 21(2.4,1.5)
  rect 0.3x0.95 smd: 8(-1.5,-2.4) 9(-1,-2.4) 10(-0.5,-2.4) 11(0,-2.4) 12(0.5,-2.4) 13(1,-2.4) 14(1.5,-2.4) 22(1.5,2.4) 23(1,2.4) 24(0.5,2.4) 25(0,2.4) 26(-0.5,2.4) 27(-1,2.4) 28(-1.5,2.4)
  rect 3.35x3.35 smd: 29(0,0)
  silkscreen extent -3.15,-2.54 2.54,2.54, body extent -2.5,-2.5 2.5,2.5, height 1
50SVPF10M [mm]
  rect 3.5x1.6 smd: 1(-2.8,0) 2(2.8,0)
  silkscreen extent -4.01,-3.3 3.3,3.3, body extent -3.65,-3.3 3.65,3.3, height 5.9
760390015 [mm]
  rect 2.06x0.96 smd: 1(-4.57,2.54) 2(-4.57,0) 3(-4.57,-2.54) 4(4.57,-2.54) 5(4.57,0) 6(4.57,2.54)
  silkscreen extent -5.9,-3.43 3.45,3.43, body extent -5.02,-3.37 5.02,3.37, height 4.16
ACT45B-510-2P-TL003 [mm]
  rect 1.4x0.9 smd paste+0 mask+0.051: 1(-2.28,1.25) 2(-2.28,-1.25) 3(2.28,-1.25) 4(2.28,1.25)
  silkscreen extent -3.22,-1.6 2.2,1.6, body extent -2.25,-1.6 2.25,1.6, height 3
B3U-1000P [mm] "SWITCH TACTILE SPST-NO 0.05A 12V"
  rect 0.82x1.72 smd: 1(-1.7,0) 2(1.7,0)
  silkscreen extent -1.57,-1.3 1.57,1.3, body extent -2,-1.26 2,1.24, height 1.6
Cap-0402 [mil]
  rect 18x25 smd mask+2.36: 1(-18.5,0) 2(18.5,0)
  silkscreen extent -31,-16 31,16, body extent -20,-10 20,10, height 19
Cap-0603 [mil]
  rect 30x35 smd mask+2.36: 1(-30,0) 2(30,0)
  silkscreen extent -49,-21 49,21, body extent -32,-16 31,16, height 34
Cap-1206 [mil] "SMD 1206"
  rect 60x70 smd: 1(-50,0) 2(50,0)
  silkscreen extent -84,-39 84,39, body extent -63,-31 63,32, height 39
CLF7045T-2R2N-D [mm]
  rect 2x2.2 smd mask+0.055: 1(-2.95,0) 2(2.95,0)
  silkscreen extent -3.63,-3.48 3.63,3.48, body extent -3.6,-3.45 3.6,3.45, height 4.53
D2Pak. [mm]
  rect 2.08x3.81 smd: 1(-2.54,-5.335) 2(2.54,-5.335)
  rect 11.43x8.89 smd: 3(0,5.335)
  silkscreen extent -5.21,-5.46 5.11,0.51, body extent -5.08,-6.6 5.02,8.79, height 4.5
DJ7391-1.5/2.8-10 [mm]
  round 2.8 hole 1.51: 1(-22.462,4.2) 2(-17.462,4.2) 3(-13.282,4.2) 4(-9.992,4.2) 5(-6.662,4.2) 6(-3.332,4.2) 7(-0.002,4.2) 8(3.328,4.2) 9(6.658,4.2) 10(9.988,4.2) 11(13.318,4.2) 12(17.462,4.2) 13(22.462,4.2) 14(-22.462,0) 15(-17.462,0) 16(-13.282,0) 17(-9.952,0) 18(-6.622,0) 19(-3.292,0) 20(0.038,0) 21(3.368,0) 22(6.698,0) 23(10.028,0) 24(13.358,0) 25(17.462,0) 26(22.462,0) 27(-22.462,-4.2) 28(-17.462,-4.2) 29(-13.282,-4.2) 30(-9.952,-4.2) 31(-6.622,-4.2) 32(-3.292,-4.2) 33(0.038,-4.2) 34(3.368,-4.2) 35(6.698,-4.2) 36(10.028,-4.2) 37(13.358,-4.2) 38(17.462,-4.2) 39(22.462,-4.2)
  oval 3x8 hole 1.51 slot 6.4 at 90 deg: MH(-30.362,-3) MH(30.362,-3)
  silkscreen extent -32.97,-12.04 33.35,5.79, body extent -32.93,-34.21 33.32,5.73, height 25.42
ESP32-WROOM-32UE-N16 [mm]
  rect 1.5x0.9 smd: 1(-8.75,8.88) 2(-8.75,7.61) 3(-8.75,6.34) 4(-8.75,5.07) 5(-8.75,3.8) 6(-8.75,2.53) 7(-8.75,1.26) 8(-8.75,-0.01) 9(-8.75,-1.28) 10(-8.75,-2.55) 11(-8.75,-3.82) 12(-8.75,-5.09) 13(-8.75,-6.36) 14(-8.75,-7.63) 25(8.75,-7.63) 26(8.75,-6.36) 27(8.75,-5.09) 28(8.75,-3.82) 29(8.75,-2.55) 30(8.75,-1.28) 31(8.75,-0.01) 32(8.75,1.26) 33(8.75,2.53) 34(8.75,3.8) 35(8.75,5.07) 36(8.75,6.34) 37(8.75,7.61) 38(8.75,8.88)
  rect 0.9x1.5 smd: 15(-5.71,-8.88) 16(-4.44,-8.88) 17(-3.17,-8.88) 18(-1.9,-8.88) 19(-0.63,-8.88) 20(0.64,-8.88) 21(1.91,-8.88) 22(3.18,-8.88) 23(4.45,-8.88) 24(5.72,-8.88)
  rect 0.9x0.9 smd: 39(-2.896,1.54) 39(-2.896,2.94) 39(-2.896,0.14) 39(-1.496,2.94) 39(-1.496,1.54) 39(-1.496,0.14) 39(-0.096,2.94) 39(-0.096,1.54) 39(-0.096,0.14)
  round 0.6 hole 0.3 mask+0: 39(-2.896,2.24) 39(-2.896,0.84) 39(-2.196,1.54) 39(-2.196,2.94) 39(-2.196,0.14) 39(-1.496,2.24) 39(-1.496,0.84) 39(-0.796,2.94) 39(-0.796,1.54) 39(-0.796,0.14) 39(-0.096,2.24) 39(-0.096,0.84)
  silkscreen extent -9.87,-9.17 9.04,10.13, body extent -9,-9.13 9,10.07, height 3.35
"Fuse 1206 (3216 Metric)" [mm] "0.126\" L x 0.062\" W x 0.026\" H (3.20mm x 1.58mm x 0.65mm)"
  rect 1.06x1.82 smd: 1(-1.528,0) 2(1.528,0)
  silkscreen extent -0.68,-0.85 0.68,0.85, body extent -1.6,-0.79 1.6,0.79, height 0.85
Ind-0805 [mm] "Inductor 0805"
  rect 1.2x1.32 smd: 1(-1,0) 2(1,0)
  silkscreen extent -0.25,-0.69 0.25,0.69, body extent -1,-0.62 1,0.63, height 0.47
LED-0603 [mm]
  rect 0.5x1 smd: 1(-0.75,0) 2(0.75,0)
  silkscreen extent -1.12,-0.66 1.75,0.66, body extent -0.82,-0.37 0.82,0.36, height 0.68
MicroSMP [mm]
  rect 2x1.1 smd paste+0 mask+0.051: 1(-0.95,0)
  rect 0.8x0.8 smd paste+0 mask+0.051: 2(0.95,0)
  silkscreen extent -1.09,-0.76 1.75,0.76, body extent -1.25,-0.65 1.25,0.65, height 0.66
Power-DI-5 [mm]
  rect 1.4x1.4 smd paste+0 mask+0.051: 1(2.032,-0.92) 2(2.032,0.92)
  rect 4.9x3.4 smd paste+0 mask+0.051: 3(-2.032,0)
  silkscreen extent -3.7,-2.07 2.57,2.07, body extent -4.19,-2.02 2.41,2.02, height 1.2
Res-0402 [mil]
  rect 18x25 smd mask+2.17: 1(-18.5,0) 2(18.5,0)
  silkscreen extent -32,-17 32,16, body extent -23,-11 23,11, height 16
Res-0603 [mil]
  rect 30x35 smd: 1(-30,0) 2(30,0)
  silkscreen extent -48,-21 48,21, body extent -31,-17 31,17, height 18
Res-1206 [mil]
  rect 60x70 smd: 1(-50,0) 2(50,0)
  silkscreen extent -84,-39 84,39, body extent -63,-31 63,31, height 24
RES-2512 [mm]
  rect 1.6x3.4 smd: 1(-3.25,0) 2(3.25,0)
  silkscreen extent -4.24,-1.85 4.24,1.85, body extent -3.17,-1.63 3.18,1.63, height 0.58
SMC [mm]
  rect 4.1x4.3 smd: 1(-3.95,0) 2(3.95,0)
  silkscreen extent -7.24,-3.05 3.58,3.05, body extent -3.9,-2.95 3.9,2.95, height 2.41
SOD323F [mm]
  rect 0.6x0.6 smd: 1(-1.05,0) 2(1.05,0)
  silkscreen extent -0.91,-0.79 2.11,0.78, body extent -1.25,-0.68 1.25,0.68, height 1
SOD-123 [mm]
  rect 0.95x0.9 smd: 1(-1.575,0) 2(1.575,0)
  silkscreen extent -1.37,-0.8 2.82,0.8, body extent -1.82,-0.78 1.83,0.78, height 1.5
SOD-123W [mm] "DIODE SCHOTTKY 30V 1A SOD123W"
  rect 1.4x1.4 smd: 1(-1.4,0) 2(1.4,0)
  silkscreen extent -1.5,-1.07 3.3,1.07, body extent -2,-0.95 2,0.95, height 1.1
SOD-523 [mm] "SOD-523 Schottky Barrier Diodes (SBD) ROHS"
  rect 0.6x0.7 smd: 1(-0.6,0) 2(0.6,0)
  silkscreen extent -0.61,-0.53 1.42,0.54, body extent -0.8,-0.4 0.8,0.4, height 0.7
"SOIC-8(0.154\", 3.90mm Width)" [mm]
  rect 1.55x0.6 smd: 1(-2.7,1.905) 2(-2.7,0.635) 3(-2.7,-0.635) 4(-2.7,-1.905) 5(2.7,-1.905) 6(2.7,-0.635) 7(2.7,0.635) 8(2.7,1.905)
  silkscreen extent -3.79,-2.51 1.8,2.51, body extent -3.01,-2.45 3.01,2.45, height 1.63
SOIC-14 [mm]
  rect 1.62x0.67 smd: 1(-2.7,3.81) 2(-2.7,2.54) 3(-2.7,1.27) 4(-2.7,0) 5(-2.7,-1.27) 6(-2.7,-2.54) 7(-2.7,-3.81) 8(2.7,-3.81) 9(2.7,-2.54) 10(2.7,-1.27) 11(2.7,0) 12(2.7,1.27) 13(2.7,2.54) 14(2.7,3.81)
  silkscreen extent -3.84,-4.37 1.88,4.37, body extent -3.01,-4.33 3.01,4.33, height 1.75
SOIC-16-300mil [mm]
  rect 1.65x0.6 smd paste+0 mask+0.07: 1(-4.875,4.445) 2(-4.875,3.175) 3(-4.875,1.905) 4(-4.875,0.635) 5(-4.875,-0.635) 6(-4.875,-1.905) 7(-4.875,-3.175) 8(-4.875,-4.445) 9(4.875,-4.445) 10(4.875,-3.175) 11(4.875,-1.905) 12(4.875,-0.635) 13(4.875,0.635) 14(4.875,1.905) 15(4.875,3.175) 16(4.875,4.445)
  silkscreen extent -6,-5.21 3.84,5.21, body extent -5.15,-5.15 5.15,5.15, height 2.65
SOT-23 [mm] "TRANS NPN 40V 0.6A SOT23"
  rect 0.82x0.92 smd: 1(-0.95,-1) 2(0.95,-1) 3(0,1)
  silkscreen extent -1.68,-1.3 1.55,0.81, body extent -1.5,-1.25 1.5,1.25, height 1.05
SOT-23-5 [mm]
  rect 1.1x0.6 smd: 1(-1.3,0.95) 2(-1.3,0) 3(-1.3,-0.95) 4(1.3,-0.95) 5(1.3,0.95)
  silkscreen extent -2.13,-1.5 0.88,1.5, body extent -1.4,-1.45 1.4,1.45, height 1.45
"SOT- 223" [mm]
  rect 1.5x2 smd: 1(-2.3,-3.05) 2(0,-3.05) 3(2.3,-3.05)
  rect 3.8x2 smd: 4(0,3.05)
  silkscreen extent -3.35,-3.2 3.3,1.8, body extent -3.25,-3.5 3.25,3.5, height 1.61
SRP1265A-8R2M [mm]
  rect 3.1x5 smd: 1(-5.55,0) 2(5.55,0)
  silkscreen extent -6.48,-6.32 6.53,6.3, body extent -6.42,-6.25 6.48,6.25, height 6.31
"Voltlink Target" [mm]
  rect 0.5x1.6 smd: 1(-2.5,-1.262) 2(-1.5,-1.262) 3(-0.5,-1.262) 4(0.5,-1.262) 5(1.5,-1.262) 6(2.5,-1.262)
  rect 1.2x1.8 smd: MP1(-3.8,1.262) MP2(3.8,1.262)
  silkscreen extent -4.06,-1.68 4.06,2.17, body extent -4,-1.49 4,2.11, height 4.25
VSSOP-10 [mm]
  rect 1.45x0.3 smd paste+0 mask+0.05: 1(-2.2,1) 2(-2.2,0.5) 3(-2.2,0) 4(-2.2,-0.5) 5(-2.2,-1) 6(2.2,-1) 7(2.2,-0.5) 8(2.2,0) 9(2.2,0.5) 10(2.2,1)
  silkscreen extent -3.18,-1.55 1.47,1.55, body extent -2.45,-1.5 2.45,1.5, height 1.07
XTSD01GLGEAG [mm]
  rect 1.741x0.711 smd paste+0 mask+0.051: 1(-3.6,1.905) 2(-3.6,0.635) 3(-3.6,-0.635) 4(-3.6,-1.905) 5(3.6,-1.905) 6(3.6,-0.635) 7(3.6,0.635) 8(3.6,1.905)
  silkscreen extent -4.74,-3.08 4.09,3.08, body extent -4,-3 4,3, height 0.77

## Part data
C1 C24 C32 C44 C47 C53 C54 C67 C68: library part CL05A105KA5NQNC, "CAP CER 1UF 25V X5R 0402", Case Code (Imperial)=0402, Case Code (Metric)=1005, Dielectric=X5R, LCSC Part Number=C52923, Manufacturer=Samsung, Max Operating Temperature=85°C, Min Operating Temperature=-55°C, Package Quantity=10000, Tolerance=10%, Voltage Rating=25V, Case/Package=0402, Category="Ceramic Capacitors", ComponentLink1Description=https://datasheet.ciiva.com/25720/cl05a105ka5nqnc-25720771.pdf?src-supplier=Digi-Key, ComponentLink1URL=https://datasheet.ciiva.com/25720/cl05a105ka5nqnc-25720771.pdf?src-supplier=Digi-Key, ComponentLink2Description=https://datasheet.ciiva.com/3777/cl05a105ka5nqnc-3777709.pdf?src-supplier=Arrow+Electronics, ComponentLink2URL=https://datasheet.ciiva.com/3777/cl05a105ka5nqnc-3777709.pdf?src-supplier=Arrow+Electronics, ComponentLink3Description=https://datasheet.ciiva.com/29198/459147-da-01-en-vs-kondensator-0402-29198339.pdf?src-supplier=Conrad, ComponentLink3URL=https://datasheet.ciiva.com/29198/459147-da-01-en-vs-kondensator-0402-29198339.pdf?src-supplier=Conrad, Construction=Flat, Depth=0.5mm, Height=0.5mm, Item Type=Capacitor, Lead Free="Lead Free", Length=1mm, Manufacturer Part Number=CL05A105KA5NQNC, Material=Ceramic, Mounting Technology="Surface Mount", Packaging="Tape and Reel", Pricing 1="10000=0.0256, 20000=0.0238, 30000=0.0228, 50000=0.0207, 100000=0.0175, 250000=0.0157 (USD)", Radiation Hardening=No, RoHS=Yes, RoHS Compliant=Yes, Series=CL, Stock 1=80000, Supplier 1="Arrow Electronics", Supplier Part Number 1=CL05A105KA5NQNC, Thickness=0.022inch, Width=0.02inch
C2 C5 C14 C15 C18 C19 C22 C27 C29 C31 C34 C36 C37 C38 C45 C48 C49 C50 C51 C52 C55 C56 C57 C58 C63 C65 C66 C73 C75 C81 C82: library part CL05B104KB54PNC, "CAP CER 0.1UF 50V X7R 0402", LCSC Part Number=C307331, Manufacturer=Samsung, Supplier Part Number 1=1276-CL05B104KB54PNCDKR-ND, Manufacturer Part Number=CL05B104KB54PNC, Pricing 1="1=0.1, 10=0.067, 50=0.0366, 100=0.0299, 500=0.02138, 1000=0.01681, 2500=0.01528, 5000=0.01406 (USD)", Stock 1=8594, Supplier 1=Digi-Key
C3 C4: library part 50SVPF10M, "CAP ALUM POLY 10UF 20% 50V SMD", LCSC Part Number=C2162323, Manufacturer=Panasonic, Supplier Part Number=667-50SVPF10M, Category="Polymer Capacitors", ComponentLink1Description=https://datasheet.ciiva.com/48542/svpf-eng-ds-48542427.pdf?src-supplier=Distrelec, ComponentLink1URL=https://datasheet.ciiva.com/48542/svpf-eng-ds-48542427.pdf?src-supplier=Distrelec, ComponentLink2Description=https://datasheet.ciiva.com/24216/svpf-os-262415-24216043.pdf?src-supplier=Mouser, ComponentLink2URL=https://datasheet.ciiva.com/24216/svpf-os-262415-24216043.pdf?src-supplier=Mouser, ComponentLink3Description=https://datasheet.ciiva.com/25761/1734360-25761263.pdf?src-supplier=Farnell, ComponentLink3URL=https://datasheet.ciiva.com/25761/1734360-25761263.pdf?src-supplier=Farnell, Item Type=Capacitor, Manufacturer Part Number=50SVPF10M, Material=4242ConductorMaterial, Pricing="1=1.12, 10=0.801, 50=0.801, 100=0.665, 1000=0.555, 10000=0.504 (USD)", RoHS=Yes, Stock=29802, Supplier=Mouser
C6 C7: library part 25SVPF100M, "CAP ALUM POLY 100UF 20% 25V SMD", Case/Package=Radial, ESR (Equivalent Series Resistance)=24mR, LCSC Part Number=C136279, Leakage Current=500uA, Manufacturer=Panasonic, Max Operating Temperature=105°C, Min Operating Temperature=-55°C, Package Quantity=1000, Ripple Current=3.2A, Supplier Part Number 1=P123675CT-ND, Tolerance=20%, Voltage=25V, Capacitance=100uF, Category="Aluminum Electrolytic Capacitors", ComponentLink1Description=https://datasheet.ciiva.com/25746/1734360-25746518.pdf?src-supplier=Farnell, ComponentLink1URL=https://datasheet.ciiva.com/25746/1734360-25746518.pdf?src-supplier=Farnell, ComponentLink2Description=https://datasheet.ciiva.com/22746/1734360-22746213.pdf?src-supplier=Element14, ComponentLink2URL=https://datasheet.ciiva.com/22746/1734360-22746213.pdf?src-supplier=Element14, ComponentLink3Description=https://datasheet.ciiva.com/24064/svpf-os-262415-24064540.pdf?src-supplier=Mouser, ComponentLink3URL=https://datasheet.ciiva.com/24064/svpf-os-262415-24064540.pdf?src-supplier=Mouser, Diameter=8mm, Dissipation Factor=12%, Height=6.9mm, Height - Seated (Max)=0.276inch, Item Type=Capacitor, Lead Free="Lead Free", Length=6.9mm, Life (Hours)=5000Hour, Manufacturer Part Number=25SVPF100M, Mount="Surface Mount", Number of Pins=7, Packaging="Tape and Reel", Pricing 1="1=1.68000, 10=1.32800, 50=1.15080, 100=0.99590, 500=0.75246 (USD)", Reach SVHC Compliant=Yes, Ripple Current (AC)=3.2A, RoHS=Yes, RoHS Compliant=Yes, Series="OS-CON, SVPF", Stock 1=5809, Supplier 1=Digi-Key, Termination=SMD/SMT, Voltage Rating=25V, Voltage Rating (DC)=25V
C8 C9: library part CC0603KRX7R9BB474, "CAP CER 0.47 uF, 50 V, ± 10%, X7R, 0603 [1608 Metric]", Dielectric=1511DielectricType, LCSC Part Number=C513577, Manufacturer=Yageo, Max Operating Temperature=125°C, Min Operating Temperature=-55°C, Package=0603, Supplier Part Number=3124150, Voltage Rating=50V, Category="Ceramic Capacitors", ComponentLink1Description=https://datasheet.octopart.com/CC0603KRX7R9BB474-Yageo-datasheet-147453679.pdf?src-supplier=Newark, ComponentLink1URL=https://datasheet.octopart.com/CC0603KRX7R9BB474-Yageo-datasheet-147453679.pdf?src-supplier=Newark, ComponentLink2Description=https://datasheet.octopart.com/CC0603KRX7R9BB474-Yageo-datasheet-166511530.pdf?src-supplier=Future+Electronics, ComponentLink2URL=https://datasheet.octopart.com/CC0603KRX7R9BB474-Yageo-datasheet-166511530.pdf?src-supplier=Future+Electronics, ComponentLink3Description=https://datasheet.octopart.com/CC0603KRX7R9BB474-Yageo-datasheet-151948686.pdf?src-supplier=Farnell, ComponentLink3URL=https://datasheet.octopart.com/CC0603KRX7R9BB474-Yageo-datasheet-151948686.pdf?src-supplier=Farnell, ComponentLink4Description=LCSC, ComponentLink4URL=https://www.lcsc.com/product-detail/Multilayer-Ceramic-Capacitors-MLCC-SMD-SMT_YAGEO-CC0603KRX7R9BB474_C513577.html, Halogen Free=5694HalogenFree, Height=900um, Item Type=Capacitor, Lead Free=5697LeadFree, Manufacturer Part Number=CC0603KRX7R9BB474, Material=4241ConductorMaterial, Pricing="4000=0.0623, 8000=0.0607, 12000=0.0598, 16000=0.0591, 20000=0.0571 (USD)", RoHS=Yes, RoHS Compliant=Yes, Stock=44000, Supplier="Future Electronics", Voltage Rating (DC)=50V
C10: library part GRM155B31H223KA12D, "50V 22nF B ±10% 0402 Multilayer Ceramic Capacitors MLCC - SMD/SMT ROHS", LCSC Part Number=C521247, Manufacturer="Murata Electronics", Package=0402, ComponentLink1Description=LCSC, ComponentLink1URL=https://www.lcsc.com/product-detail/Multilayer-Ceramic-Capacitors-MLCC-SMD-SMT_Murata-Electronics-GRM155B31H223KA12D_C521247.html, Item Type=Capacitor, Manufacturer Part Number=GRM155B31H223KA12D
C11: library part GRM155R11H471KA01D, "50V 470pF ±10% 0402 Multilayer Ceramic Capacitors MLCC - SMD/SMT ROHS", LCSC Part Number=C576458, Manufacturer="Murata Electronics", Package=0402, ComponentLink1Description=LCSC, ComponentLink1URL=https://www.lcsc.com/product-detail/Multilayer-Ceramic-Capacitors-MLCC-SMD-SMT_Murata-Electronics-GRM155R11H471KA01D_C576458.html, Item Type=Capacitor, Manufacturer Part Number=GRM155R11H471KA01D
C12: library part GRM155R71E473KA88D, "CAP CER 0.047UF 25V X7R 0402", Case Code (Imperial)=0402, Case Code (Metric)=1005, Dielectric=X7R, LCSC Part Number=C77017, Manufacturer=Murata, Max Operating Temperature=125°C, Min Operating Temperature=-55°C, Package Quantity=1, Supplier Part Number 1=2478015P, Tolerance=10%, Voltage=25V, Case/Package=0402, Category="Ceramic Capacitors", ComponentLink1Description=https://datasheet.ciiva.com/34302/1856425-34302854.pdf?src-supplier=Jameco, ComponentLink1URL=https://datasheet.ciiva.com/34302/1856425-34302854.pdf?src-supplier=Jameco, ComponentLink2Description=https://datasheet.ciiva.com/131/grm155r71e473ka88-01-131494.pdf?src-supplier=Digi-Key, ComponentLink2URL=https://datasheet.ciiva.com/131/grm155r71e473ka88-01-131494.pdf?src-supplier=Digi-Key, ComponentLink3Description=https://datasheet.ciiva.com/18184/getdatasheetpartid-153136-18184712.pdf?src-supplier=Verical, ComponentLink3URL=https://datasheet.ciiva.com/18184/getdatasheetpartid-153136-18184712.pdf?src-supplier=Verical, ComponentLink4Description=https://datasheet.ciiva.com/29199/454180-da-01-en-vs-kondensator-0402-29199826.pdf?src-supplier=Conrad, ComponentLink4URL=https://datasheet.ciiva.com/29199/454180-da-01-en-vs-kondensator-0402-29199826.pdf?src-supplier=Conrad, ComponentLink5Description=https://datasheet.ciiva.com/14103/grmseries-highdielectrictype-eng-14103754.pdf?src-supplier=Distrelec, ComponentLink5URL=https://datasheet.ciiva.com/14103/grmseries-highdielectrictype-eng-14103754.pdf?src-supplier=Distrelec, ComponentLink6Description=https://datasheet.ciiva.com/7937/608985-7937623.pdf?src-supplier=Element14, ComponentLink6URL=https://datasheet.ciiva.com/7937/608985-7937623.pdf?src-supplier=Element14, ComponentLink7Description=https://datasheet.ciiva.com/131/grm155r71e473ka88-01-131493.pdf?src-supplier=Digi-Key, ComponentLink7URL=https://datasheet.ciiva.com/131/grm155r71e473ka88-01-131493.pdf?src-supplier=Digi-Key, ComponentLink8Description=https://datasheet.ciiva.com/131/grm155r71e473ka88-01-131492.pdf?src-supplier=Digi-Key, ComponentLink8URL=https://datasheet.ciiva.com/131/grm155r71e473ka88-01-131492.pdf?src-supplier=Digi-Key, ComponentLink9Description=https://datasheet.ciiva.com/5424/product-5424844.pdf?src-supplier=Mouser, ComponentLink9URL=https://datasheet.ciiva.com/5424/product-5424844.pdf?src-supplier=Mouser, ComponentLink10Description=https://datasheet.ciiva.com/2989/product-2989395.pdf?src-supplier=Avnet, ComponentLink10URL=https://datasheet.ciiva.com/2989/product-2989395.pdf?src-supplier=Avnet, ComponentLink11Description=https://datasheet.ciiva.com/16213/product-16213823.pdf?src-supplier=Future+Electronics, ComponentLink11URL=https://datasheet.ciiva.com/16213/product-16213823.pdf?src-supplier=Future+Electronics, Construction=Flat, Depth=0.5mm, Height=0.5mm, Item Type=Capacitor, Lead Free="Lead Free", Length=1mm, Manufacturer Part Number=GRM155R71E473KA88D, Material=Ceramic, Mounting Technology="Surface Mount", Packaging="Tape and Reel", Pins=2, Pricing 1="1000=0.00007, 8000=0.00900 (GBP)", Radiation Hardening=No, Reach SVHC Compliant=Yes, RoHS=Yes, RoHS Compliant=Yes, Series=GRM, Stock 1=10000, Supplier 1=Rs, Termination=SMD/SMT, Thickness=0.022inch, Voltage Rating=25V, Voltage Rating (DC)=25V, Width=0.02inch
C13: library part GRM1555C1H102JA01D, "CAP CER 1000PF 50V C0G/NP0 0402", Case Code (Imperial)=0402, Case Code (Metric)=1005, Dielectric=C0G, Dielectric Material=Ceramic, Insulation Resistance=10GR, LCSC Part Number=C76947, Manufacturer=Murata, Max Operating Temperature=125°C, Min Operating Temperature=-55°C, Package Quantity=1, Temperature Coefficient=30ppm/°C, Tolerance=5%, Voltage=50V, Capacitance=1nF, Case/Package=0402, Category="Ceramic Capacitors", ComponentLink1Description=https://datasheet.ciiva.com/34302/1855908-34302849.pdf?src-supplier=Jameco, ComponentLink1URL=https://datasheet.ciiva.com/34302/1855908-34302849.pdf?src-supplier=Jameco, ComponentLink2Description=https://datasheet.ciiva.com/132/product-132800.pdf?src-supplier=Digi-Key, ComponentLink2URL=https://datasheet.ciiva.com/132/product-132800.pdf?src-supplier=Digi-Key, ComponentLink3Description=https://datasheet.ciiva.com/132/grm1555c1h102ja01-01-132799.pdf?src-supplier=Digi-Key, ComponentLink3URL=https://datasheet.ciiva.com/132/grm1555c1h102ja01-01-132799.pdf?src-supplier=Digi-Key, ComponentLink4Description=https://datasheet.ciiva.com/11786/0900766b807a1cab-11786727.pdf?src-supplier=RSComponents, ComponentLink4URL=https://datasheet.ciiva.com/11786/0900766b807a1cab-11786727.pdf?src-supplier=RSComponents, ComponentLink5Description=https://datasheet.ciiva.com/29200/453569-da-01-en-vs-kondensator-0402-29200121.pdf?src-supplier=Conrad, ComponentLink5URL=https://datasheet.ciiva.com/29200/453569-da-01-en-vs-kondensator-0402-29200121.pdf?src-supplier=Conrad, ComponentLink6Description=https://datasheet.ciiva.com/7828/4360-7828821.pdf?src-supplier=Element14, ComponentLink6URL=https://datasheet.ciiva.com/7828/4360-7828821.pdf?src-supplier=Element14, ComponentLink7Description=https://datasheet.ciiva.com/14116/grmseries-tc-hitype-eng-14116919.pdf?src-supplier=Distrelec, ComponentLink7URL=https://datasheet.ciiva.com/14116/grmseries-tc-hitype-eng-14116919.pdf?src-supplier=Distrelec, ComponentLink8Description=https://datasheet.ciiva.com/14116/grmseries-tc-hitype-eng-14116858.pdf?src-supplier=Distrelec, ComponentLink8URL=https://datasheet.ciiva.com/14116/grmseries-tc-hitype-eng-14116858.pdf?src-supplier=Distrelec, ComponentLink9Description=https://datasheet.ciiva.com/132/grm1555c1h102ja01-01-132801.pdf?src-supplier=Digi-Key, ComponentLink9URL=https://datasheet.ciiva.com/132/grm1555c1h102ja01-01-132801.pdf?src-supplier=Digi-Key, ComponentLink10Description=https://datasheet.ciiva.com/7828/1747436-7828822.pdf?src-supplier=Element14, ComponentLink10URL=https://datasheet.ciiva.com/7828/1747436-7828822.pdf?src-supplier=Element14, Construction=Flat, Depth=0.5mm, Height=0.5mm, Item Type=Capacitor, Lead Free="Lead Free", Length=1mm, Manufacturer Part Number=GRM1555C1H102JA01D, Material=Ceramic, Mount="Surface Mount", Number of Pins=2, Packaging="Tape and Reel", Pricing 1="10000=0.00648, 20000=0.00613, 40000=0.00578, 60000=0.00543, 80000=0.00508, 100000=0.00473, 1000000=0.00438 (USD)", Radiation Hardening=No, Reach SVHC Compliant=Yes, RoHS=Yes, RoHS Compliant=Yes, Series=GRM, Size=0.5mm, Stock 1=800000, Supplier 1=Avnet, Supplier Part Number 1=GRM1555C1H102JA01D, Termination=SMD/SMT, Thickness=0.022inch, Voltage Rating=50V, Voltage Rating (DC)=50V, Width=0.5mm
C16 C17 C33: library part CL10A475KA8NQNC, "CAP CER 4.7UF 25V X5R 0603", Capacitance=4.7uF, Case Code (Imperial)=0603, Case Code (Metric)=1608, Dielectric=X5R, LCSC Part Number=C69335, Manufacturer=Samsung, Max Operating Temperature=85°C, Min Operating Temperature=-55°C, Package Quantity=1, Supplier Part Number 1=1276-1900-1-ND, Tolerance=10%, Voltage Rating=25V, Case/Package=0603, ComponentLink1Description=http://www.samsungsem.com/kr/support/product-search/mlcc/CL10A475KA8NQNC.jsp?src-supplier=Digi-Key, ComponentLink1URL=http://www.samsungsem.com/kr/support/product-search/mlcc/CL10A475KA8NQNC.jsp?src-supplier=Digi-Key, Contact Plating=Tin, Depth=0.8mm, Lead Free="Lead Free", Length=1.6mm, Manufacturer Part Number=CL10A475KA8NQNC, Mount="Surface Mount", Packaging="Tape and Reel", Pricing 1="1=0.37, 10=0.255, 100=0.1528, 500=0.11456, 1000=0.09675 (USD)", Stock 1=2252340, Supplier 1=Digi-Key, Termination=Wraparound, Thickness=0.035inch, Width=0.031inch
C20 C21: library part GRM31CR61E476ME44L, "CAP CER 47UF 25V X5R 1206", Dielectric=X5R, LCSC Part Number=C403725, Manufacturer=Murata, Supplier Part Number 1=490-16268-2-ND, Tolerance=20%, Voltage Rating (DC)=25V, Capacitance=47uF, Category="Ceramic Capacitors", ComponentLink1Description=https://search.murata.co.jp/Ceramy/image/img/A01X/partnumbering_e_01.pdf?src-supplier=Digi-Key, ComponentLink1URL=https://search.murata.co.jp/Ceramy/image/img/A01X/partnumbering_e_01.pdf?src-supplier=Digi-Key, Item Type=Capacitor, Length=3.2mm, Manufacturer Part Number=GRM31CR61E476ME44L, RoHS=Yes, Supplier 1=Digi-Key, Thickness=1.6mm, Width=1.6mm
C23: library part CC0402KRX5R7BB105, "CAP CER 1UF 16V X5R 0402", Case Code (Imperial)=0402, Case Code (Metric)=1005, Dielectric=X5R, LCSC Part Number=C325464, Manufacturer=Yageo, Max Operating Temperature=85°C, Min Operating Temperature=-55°C, Supplier Part Number 1=311-1691-6-ND, Tolerance=10%, Voltage Rating=16V, Capacitance=1uF, Case/Package=0402, ComponentLink1Description=http://www.yageo.com/documents/recent/UPY-GPHC_X5R_4V-to-50V_12.pdf?src-supplier=Avnet+Europe, ComponentLink1URL=http://www.yageo.com/documents/recent/UPY-GPHC_X5R_4V-to-50V_12.pdf?src-supplier=Avnet+Europe, Composition=Ceramic, Depth=0.5mm, Halogen Free="Halogen Free", Height=0.5mm, Item Type=Capacitor, Lead Free="Lead Free", Length=1mm, Manufacturer Part Number=CC0402KRX5R7BB105, Mount="Surface Mount", Packaging="Tape and Reel", Pricing 1="1=0.36, 10=0.252, 100=0.1512, 500=0.1134, 1000=0.09576, 2500=0.09072, 5000=0.08568 (USD)", Radiation Hardening=No, Stock 1=1405667, Supplier 1=Digi-Key, Termination=SMD/SMT, Thickness=0.022inch, Voltage Rating (DC)=16V, Weight=2.3E-05oz, Width=0.02inch
C25 C26 C28 C30 C39 C43 C46: library part CC0402MRX5R6BB106, "CAP CER 10UF 10V X5R 0402", Case Code (Imperial)=0402, Case Code (Metric)=1005, LCSC Part Number=C962143, Manufacturer=Yageo, Max Operating Temperature=85°C, Min Operating Temperature=-55°C, Supplier Part Number 1=6097631, Tolerance=20%, Voltage Rating=10V, Capacitance=10uF, Case/Package=0402, Category="Ceramic Capacitors", ComponentLink1Description=http://www.yageo.com/documents/recent/UPY-GPHC_X5R_4V-to-50V_25.pdf?src-supplier=Digi-Key, ComponentLink1URL=http://www.yageo.com/documents/recent/UPY-GPHC_X5R_4V-to-50V_25.pdf?src-supplier=Digi-Key, Item Type=Capacitor, Manufacturer Part Number=CC0402MRX5R6BB106, Mount="Surface Mount", Packaging="Tape and Reel", Pricing 1="10000=0.02650, 20000=0.02590, 30000=0.02550, 40000=0.02530, 50000=0.02450 (USD)", RoHS=Yes, RoHS Compliant=Yes, Stock 1=80000, Supplier 1="Future Electronics"
C35: library part GRM158R61A226ME15D, "CAP CER 22UF 10V X5R 0402", Case/Package=343Case, Dielectric=1537DielectricType, Max Operating Temperature=85°C, Min Operating Temperature=-55°C, Supplier Part Number=490-GRM158R61A226ME15DCT-ND, Tolerance=20%, Voltage Rating=10V, Category="Ceramic Capacitors", Height=800um, Item Type=Capacitor, Length=1mm, Material=4241ConductorMaterial, Pricing="1=0.45, 10=0.299, 50=0.2202, 100=0.1794, 500=0.1416, 1000=0.11957, 2500=0.11328 (USD)", RoHS=Yes, Stock=26634, Supplier=Digi-Key, Thickness=800um, Voltage Rating (DC)=10V, Width=500um
C40 C42: library part CGA3E2C0G2A680JT0Y0N, "CAP CER 68PF 100V C0G 0603", LCSC Part Number=C694224, Manufacturer=CGA3E2C0G2A680J080AA, Package=0603, Item Type=Capacitor, Manufacturer Part Number=CGA3E2C0G2A680JT0Y0N
C41: library part CC0603JRNPO9BN472, "CAP CER 4700PF 50V C0G/NPO 0603", LCSC Part Number=C576818, Manufacturer=Yageo, Supplier Part Number 1=13-CC0603JRNPO9BN472CT-ND, Category="Ceramic Capacitors", ComponentLink1Description=LCSC, ComponentLink1URL=https://www.lcsc.com/product-detail/Multilayer-Ceramic-Capacitors-MLCC-SMD-SMT_YAGEO-CC0603JRNPO9BN472_C576818.html, Item Type=Capacitor, Manufacturer Part Number=CC0603JRNPO9BN472, Pricing 1="1=0.48000, 10=0.33000, 50=0.23100, 100=0.19800, 500=0.14854, 1000=0.12543 (USD)", RoHS=Yes, RoHS Compliant=Yes, Stock 1=31779, Supplier 1=Digi-Key
C59 C60 C61 C69 C70 C71 C76 C77 C78 C83 C84 C85: library part CC0402JRX7R7BB223, "CAP CER 0.022UF 16V X7R 0402", Case Code (Imperial)=0402, Case Code (Metric)=1005, Dielectric=X7R, LCSC Part Number=C541459, Manufacturer=Yageo, Max Operating Temperature=125°C, Min Operating Temperature=-55°C, Supplier Part Number=311-3758-1-ND, Tolerance=5%, Voltage Rating=16V, Case/Package=0402, Category="Ceramic Capacitors", ComponentLink1Description=https://datasheet.ciiva.com/13264/upy-gphc-x7r-6-3v-to-50v-8-12304-13264039.pdf?src-supplier=Mouser, ComponentLink1URL=https://datasheet.ciiva.com/13264/upy-gphc-x7r-6-3v-to-50v-8-12304-13264039.pdf?src-supplier=Mouser, Halogen Free=5694HalogenFree, Item Type=Capacitor, Lead Free=5697LeadFree, Length=0.039inch, Manufacturer Part Number=CC0402JRX7R7BB223, Mounting Technology="Surface Mount", Packaging="Tape and Reel", Pricing="1=0.1, 10=0.033, 50=0.0192, 100=0.0149, 500=0.0112, 1000=0.0088, 2500=0.008, 5000=0.00736 (USD)", RoHS=Yes, RoHS Compliant=Yes, Series=CC, Stock=4203, Supplier=Digikey, Termination=SMD/SMT, Thickness=0.022inch, Voltage Rating (DC)=16V, Weight=2.3E-05oz, Width=0.5mm
C62 C72 C79 C86: library part CC0402JRX7R7BB104, "CAP CER 0.1UF 16V X7R 0402", Case Code (Imperial)=0402, Case Code (Metric)=1005, Dielectric=X7R, LCSC Part Number=C541464, Manufacturer=Yageo, Max Operating Temperature=125°C, Min Operating Temperature=-55°C, Package Quantity=10000, Supplier Part Number=311-1676-1-ND, Tolerance=5%, Voltage Rating=16V, Case/Package=0402, Category="Ceramic Capacitors", ComponentLink1Description=https://datasheet.ciiva.com/13210/upy-gphc-x7r-6-3v-to-50v-8-12304-13210152.pdf?src-supplier=Mouser, ComponentLink1URL=https://datasheet.ciiva.com/13210/upy-gphc-x7r-6-3v-to-50v-8-12304-13210152.pdf?src-supplier=Mouser, Construction=Flat, Halogen Free="Halogen Free", Height=0.5mm, Item Type=Capacitor, Lead Free="Lead Free", Length=0.039inch, Manufacturer Part Number=CC0402JRX7R7BB104, Material=4241ConductorMaterial, Mounting Technology="Surface Mount", Packaging="Tape and Reel", Pricing="1=0.1, 10=0.046, 50=0.0262, 100=0.0203, 500=0.01528, 1000=0.012, 2500=0.01091, 5000=0.01004 (USD)", RoHS=Yes, RoHS Compliant=Yes, Series=CC, Stock=1659111, Supplier=Digikey, Thickness=0.022inch, Voltage Rating (DC)=16V, Width=0.02inch
C64 C74 C80 C87: library part CC0402JRX7R7BB153, "CAP CER 0.015UF 16V X7R 0402", Case Code (Imperial)=0402, Case Code (Metric)=1005, Dielectric=X7R, LCSC Part Number=C527002, Manufacturer=Yageo, Max Operating Temperature=125°C, Min Operating Temperature=-55°C, Supplier Part Number=13-CC0402JRX7R7BB153CT-ND, Tolerance=5%, Voltage Rating=16V, Case/Package=0402, Category="Ceramic Capacitors", ComponentLink1Description=https://datasheet.ciiva.com/13263/upy-gphc-x7r-6-3v-to-50v-8-12304-13263342.pdf?src-supplier=Mouser, ComponentLink1URL=https://datasheet.ciiva.com/13263/upy-gphc-x7r-6-3v-to-50v-8-12304-13263342.pdf?src-supplier=Mouser, Halogen Free="Halogen Free", Item Type=Capacitor, Lead Free="Lead Free", Length=0.039inch, Manufacturer Part Number=CC0402JRX7R7BB153, Mounting Technology="Surface Mount", Packaging="Tape and Reel", Pricing="1=0.1, 10=0.045, 50=0.0258, 100=0.0201, 500=0.0151, 1000=0.01186, 2500=0.01078, 5000=0.00992 (USD)", RoHS=Yes, RoHS Compliant=Yes, Series=CC, Stock=24539, Supplier=Digikey, Termination=SMD/SMT, Thickness=0.022inch, Voltage Rating (DC)=16V, Weight=2.3E-05oz, Width=0.02inch